# Altium PCB AirBnB-v1.1.PcbDoc (part 1 of 8)
Units mm, origin at the board's own origin, x right, y up, seen from the top; angles counter-clockwise.
Board outline 135.99 x 145 mm, 4 copper layers (Top Layer, Layer 2, Layer 3, Bottom Layer), stack 1.566 mm thick; 343 components, 205 nets, 1123 pads, 557 vias.
Unrouted connection lines stored in the file: 129.
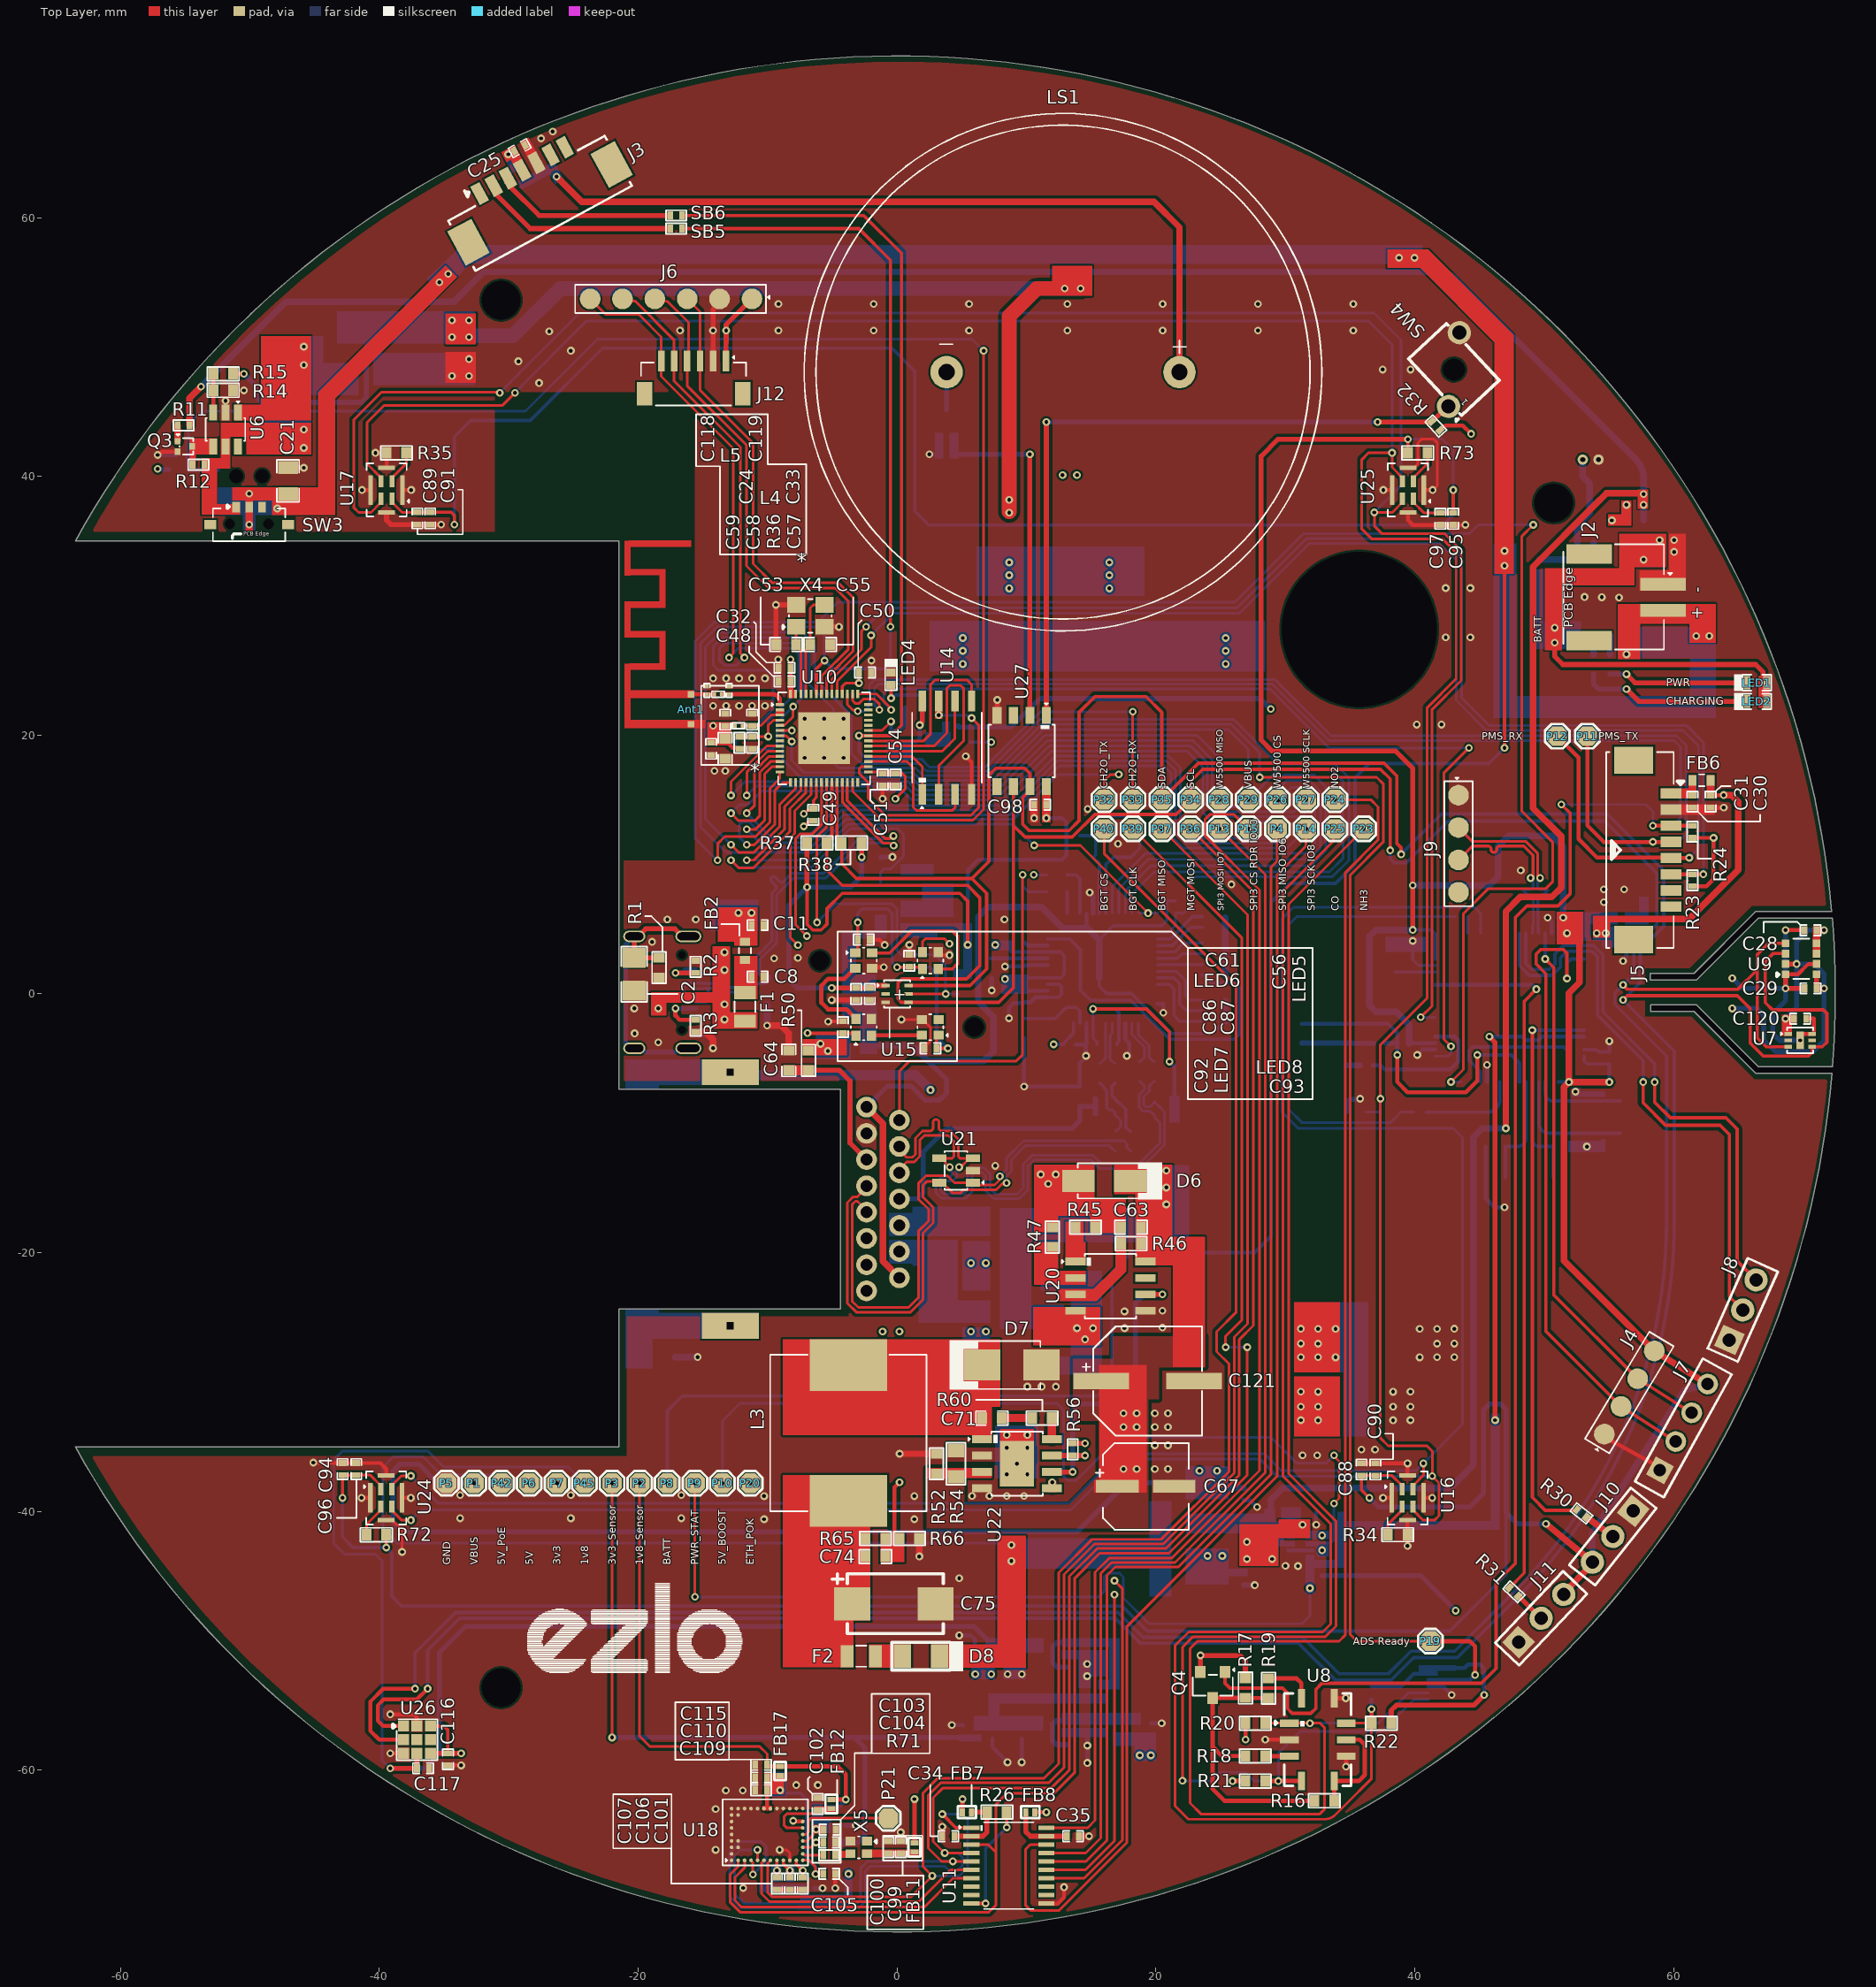
[diagram p0: Top Layer view]
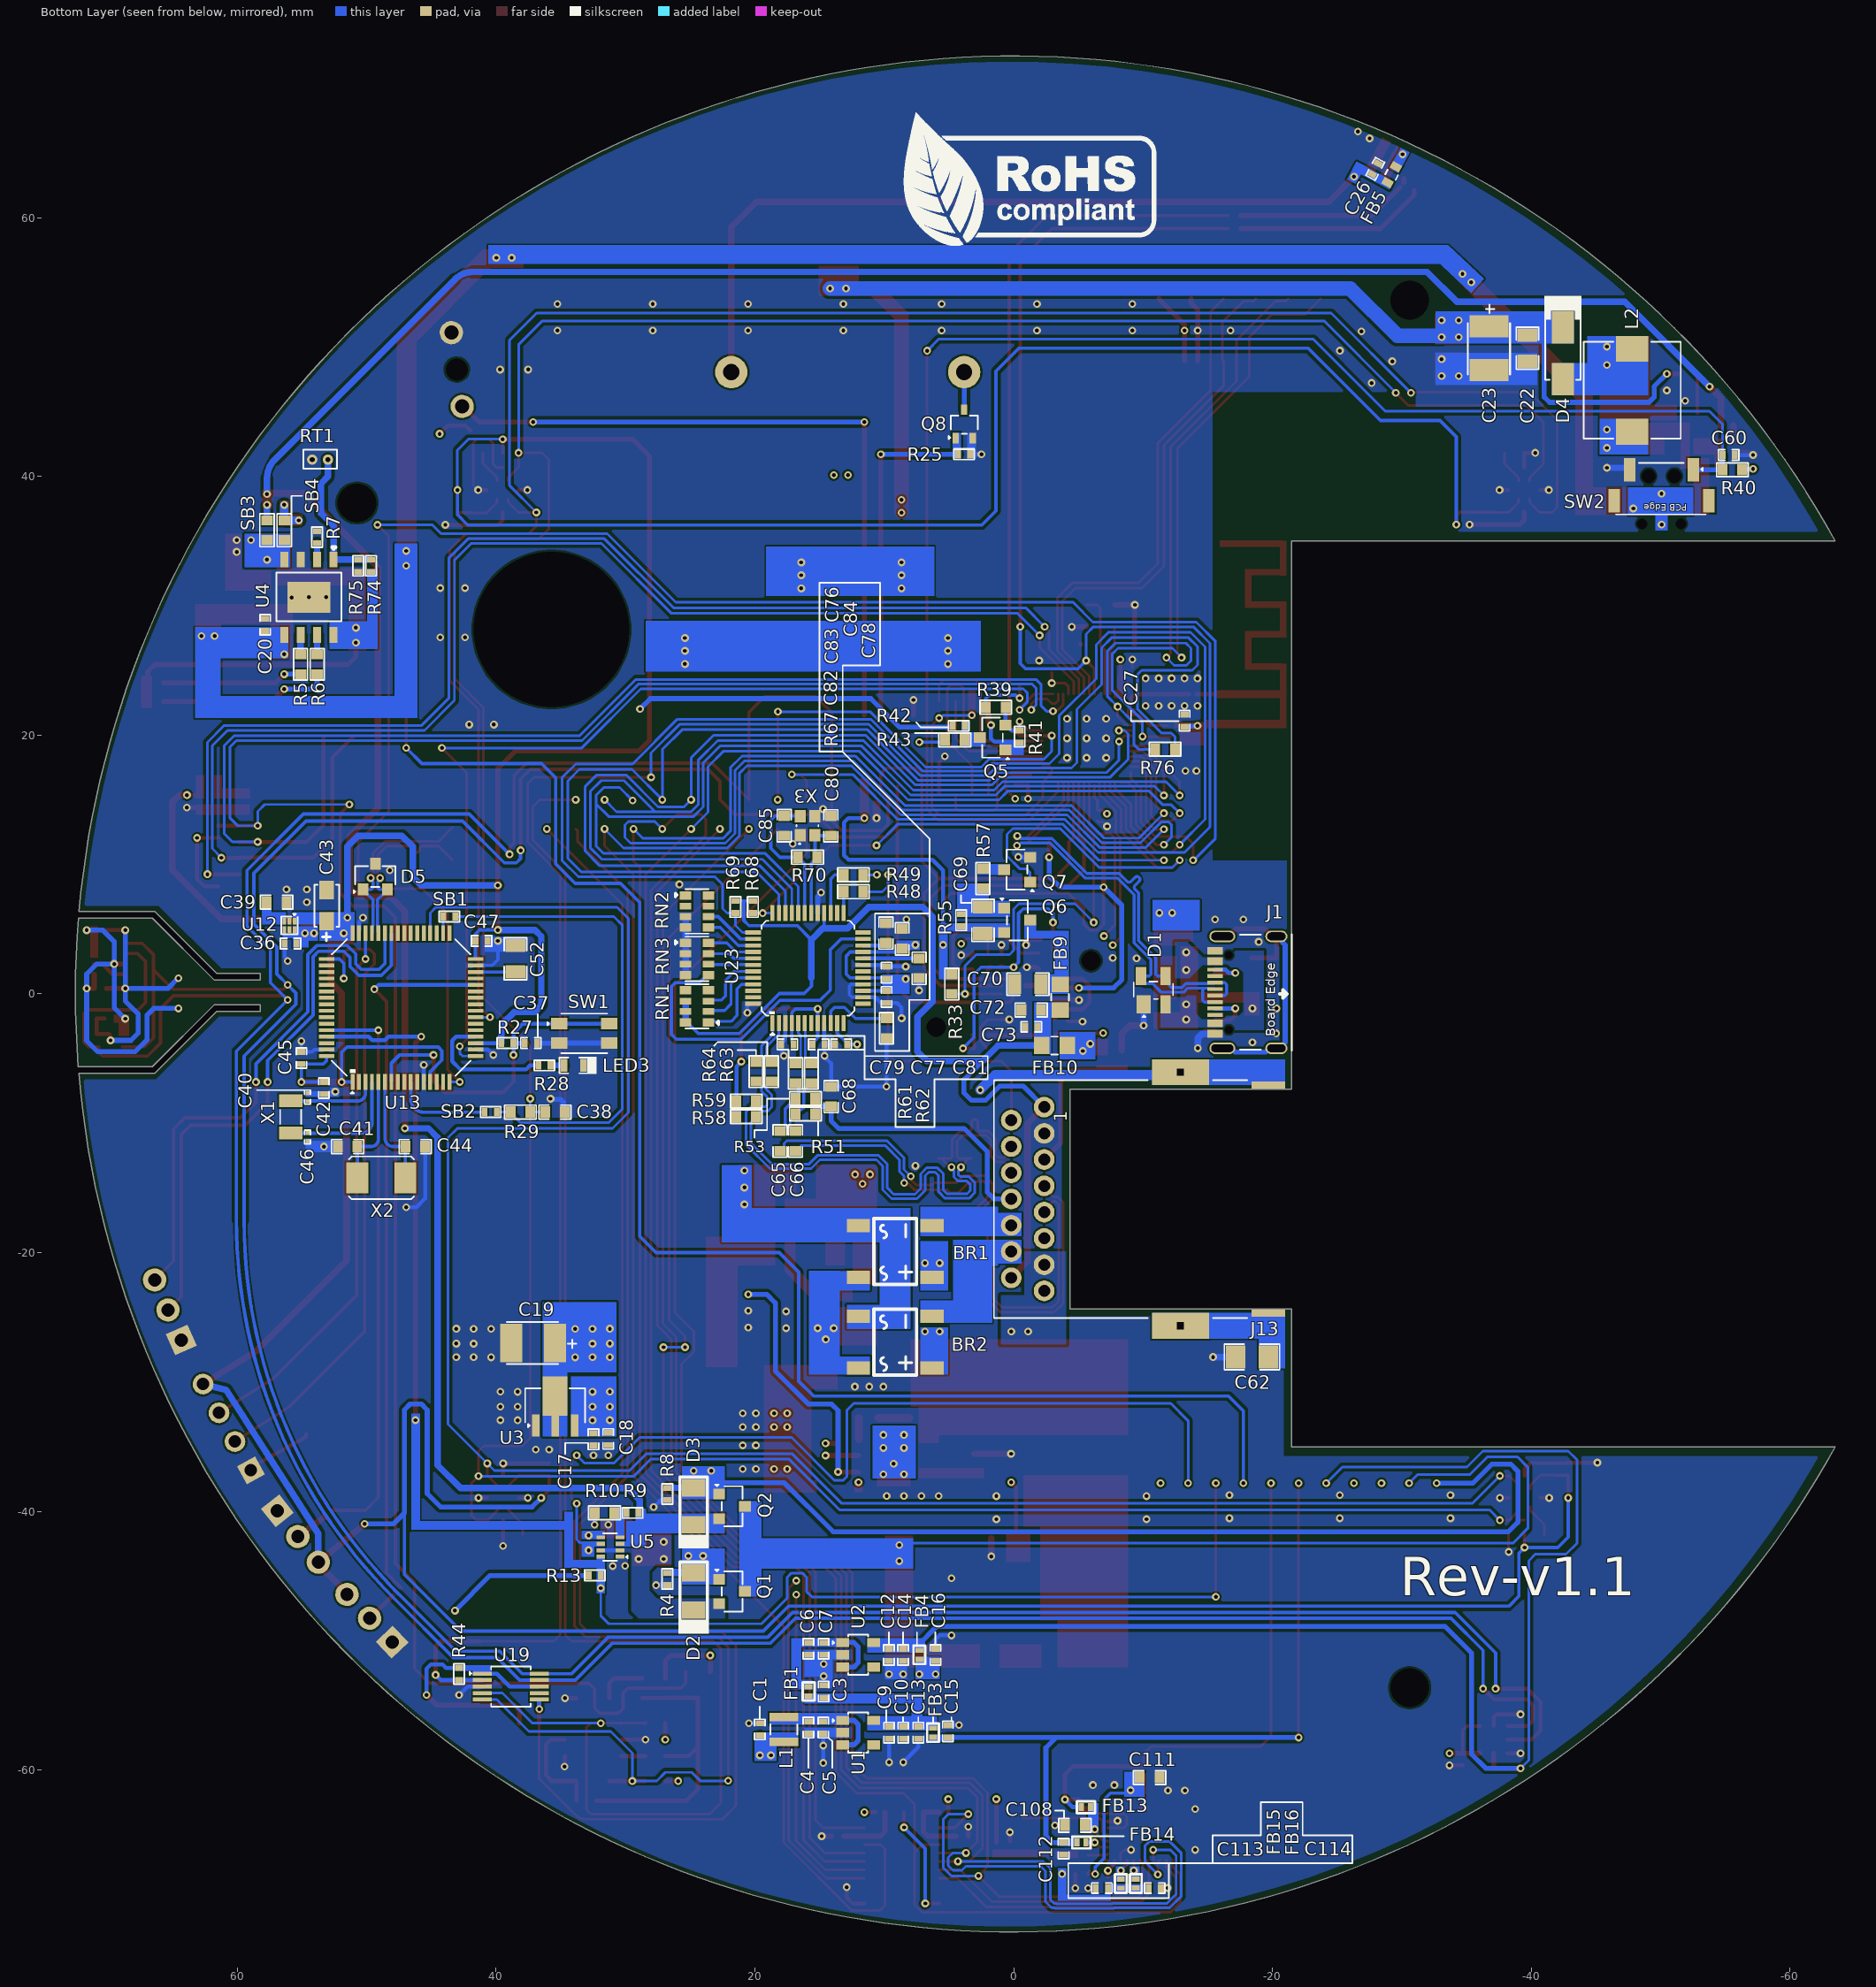
[diagram p1: Bottom Layer view, seen from below]
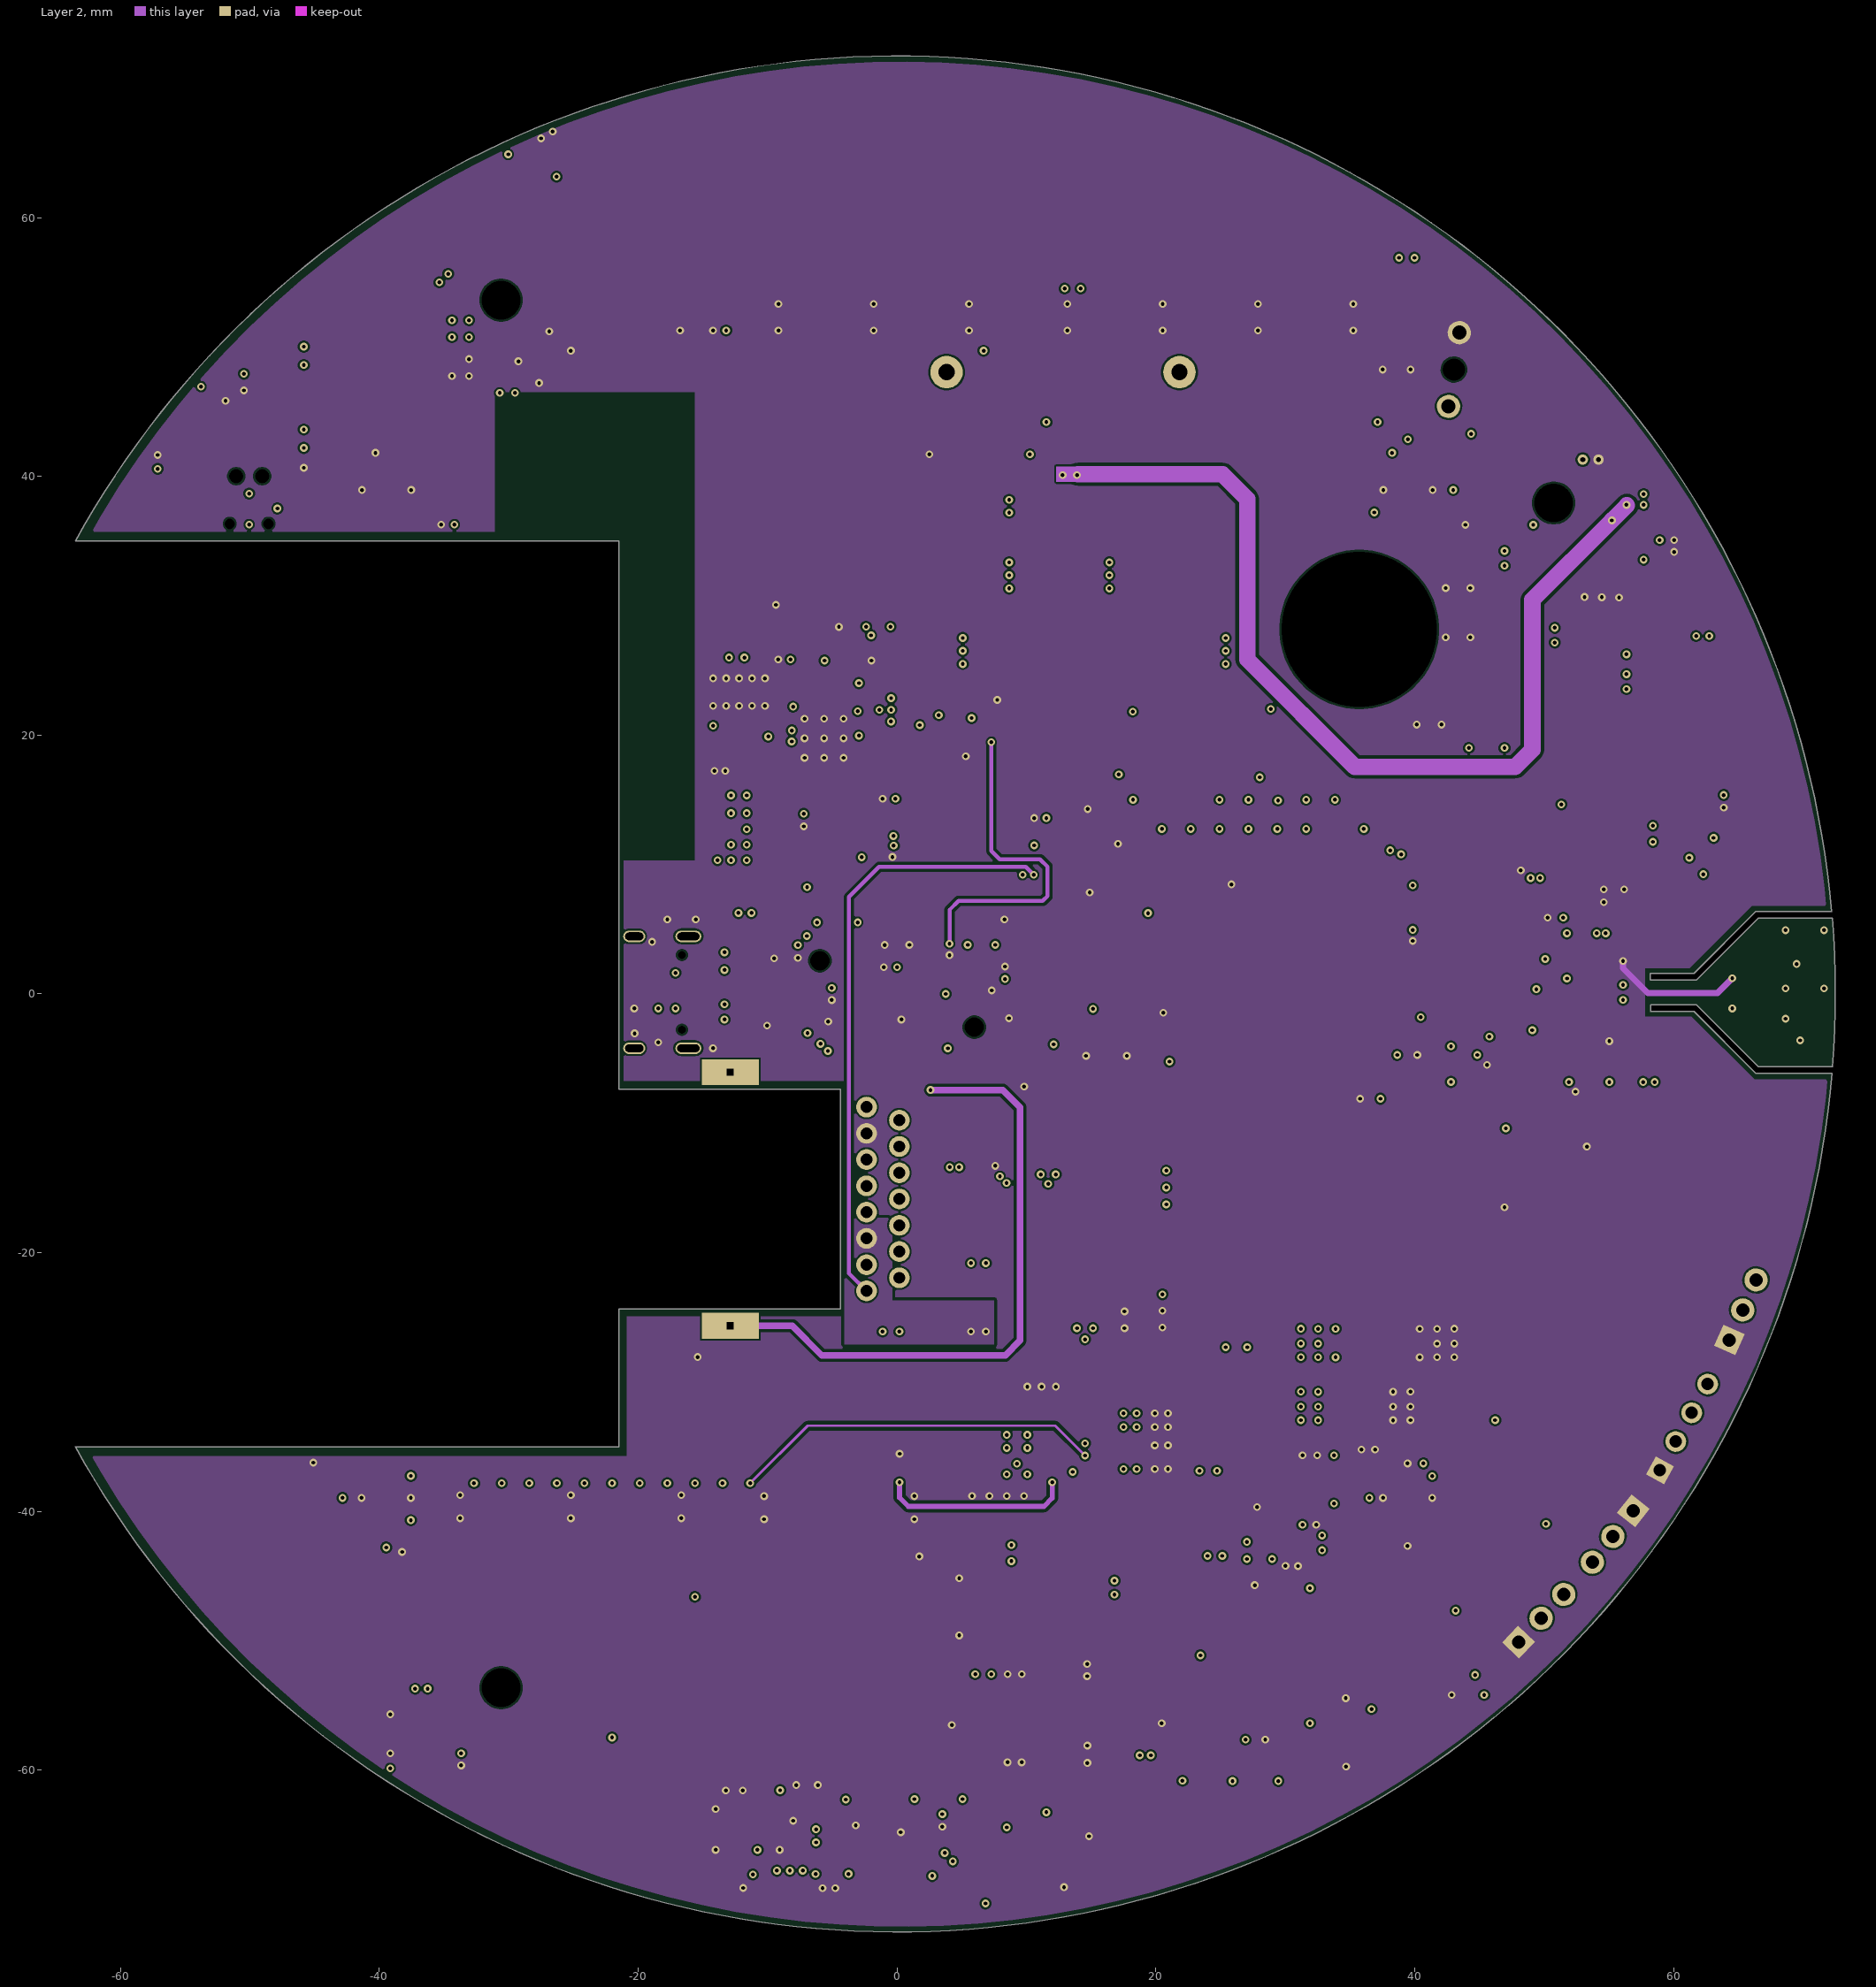
[diagram p2: Layer 2]
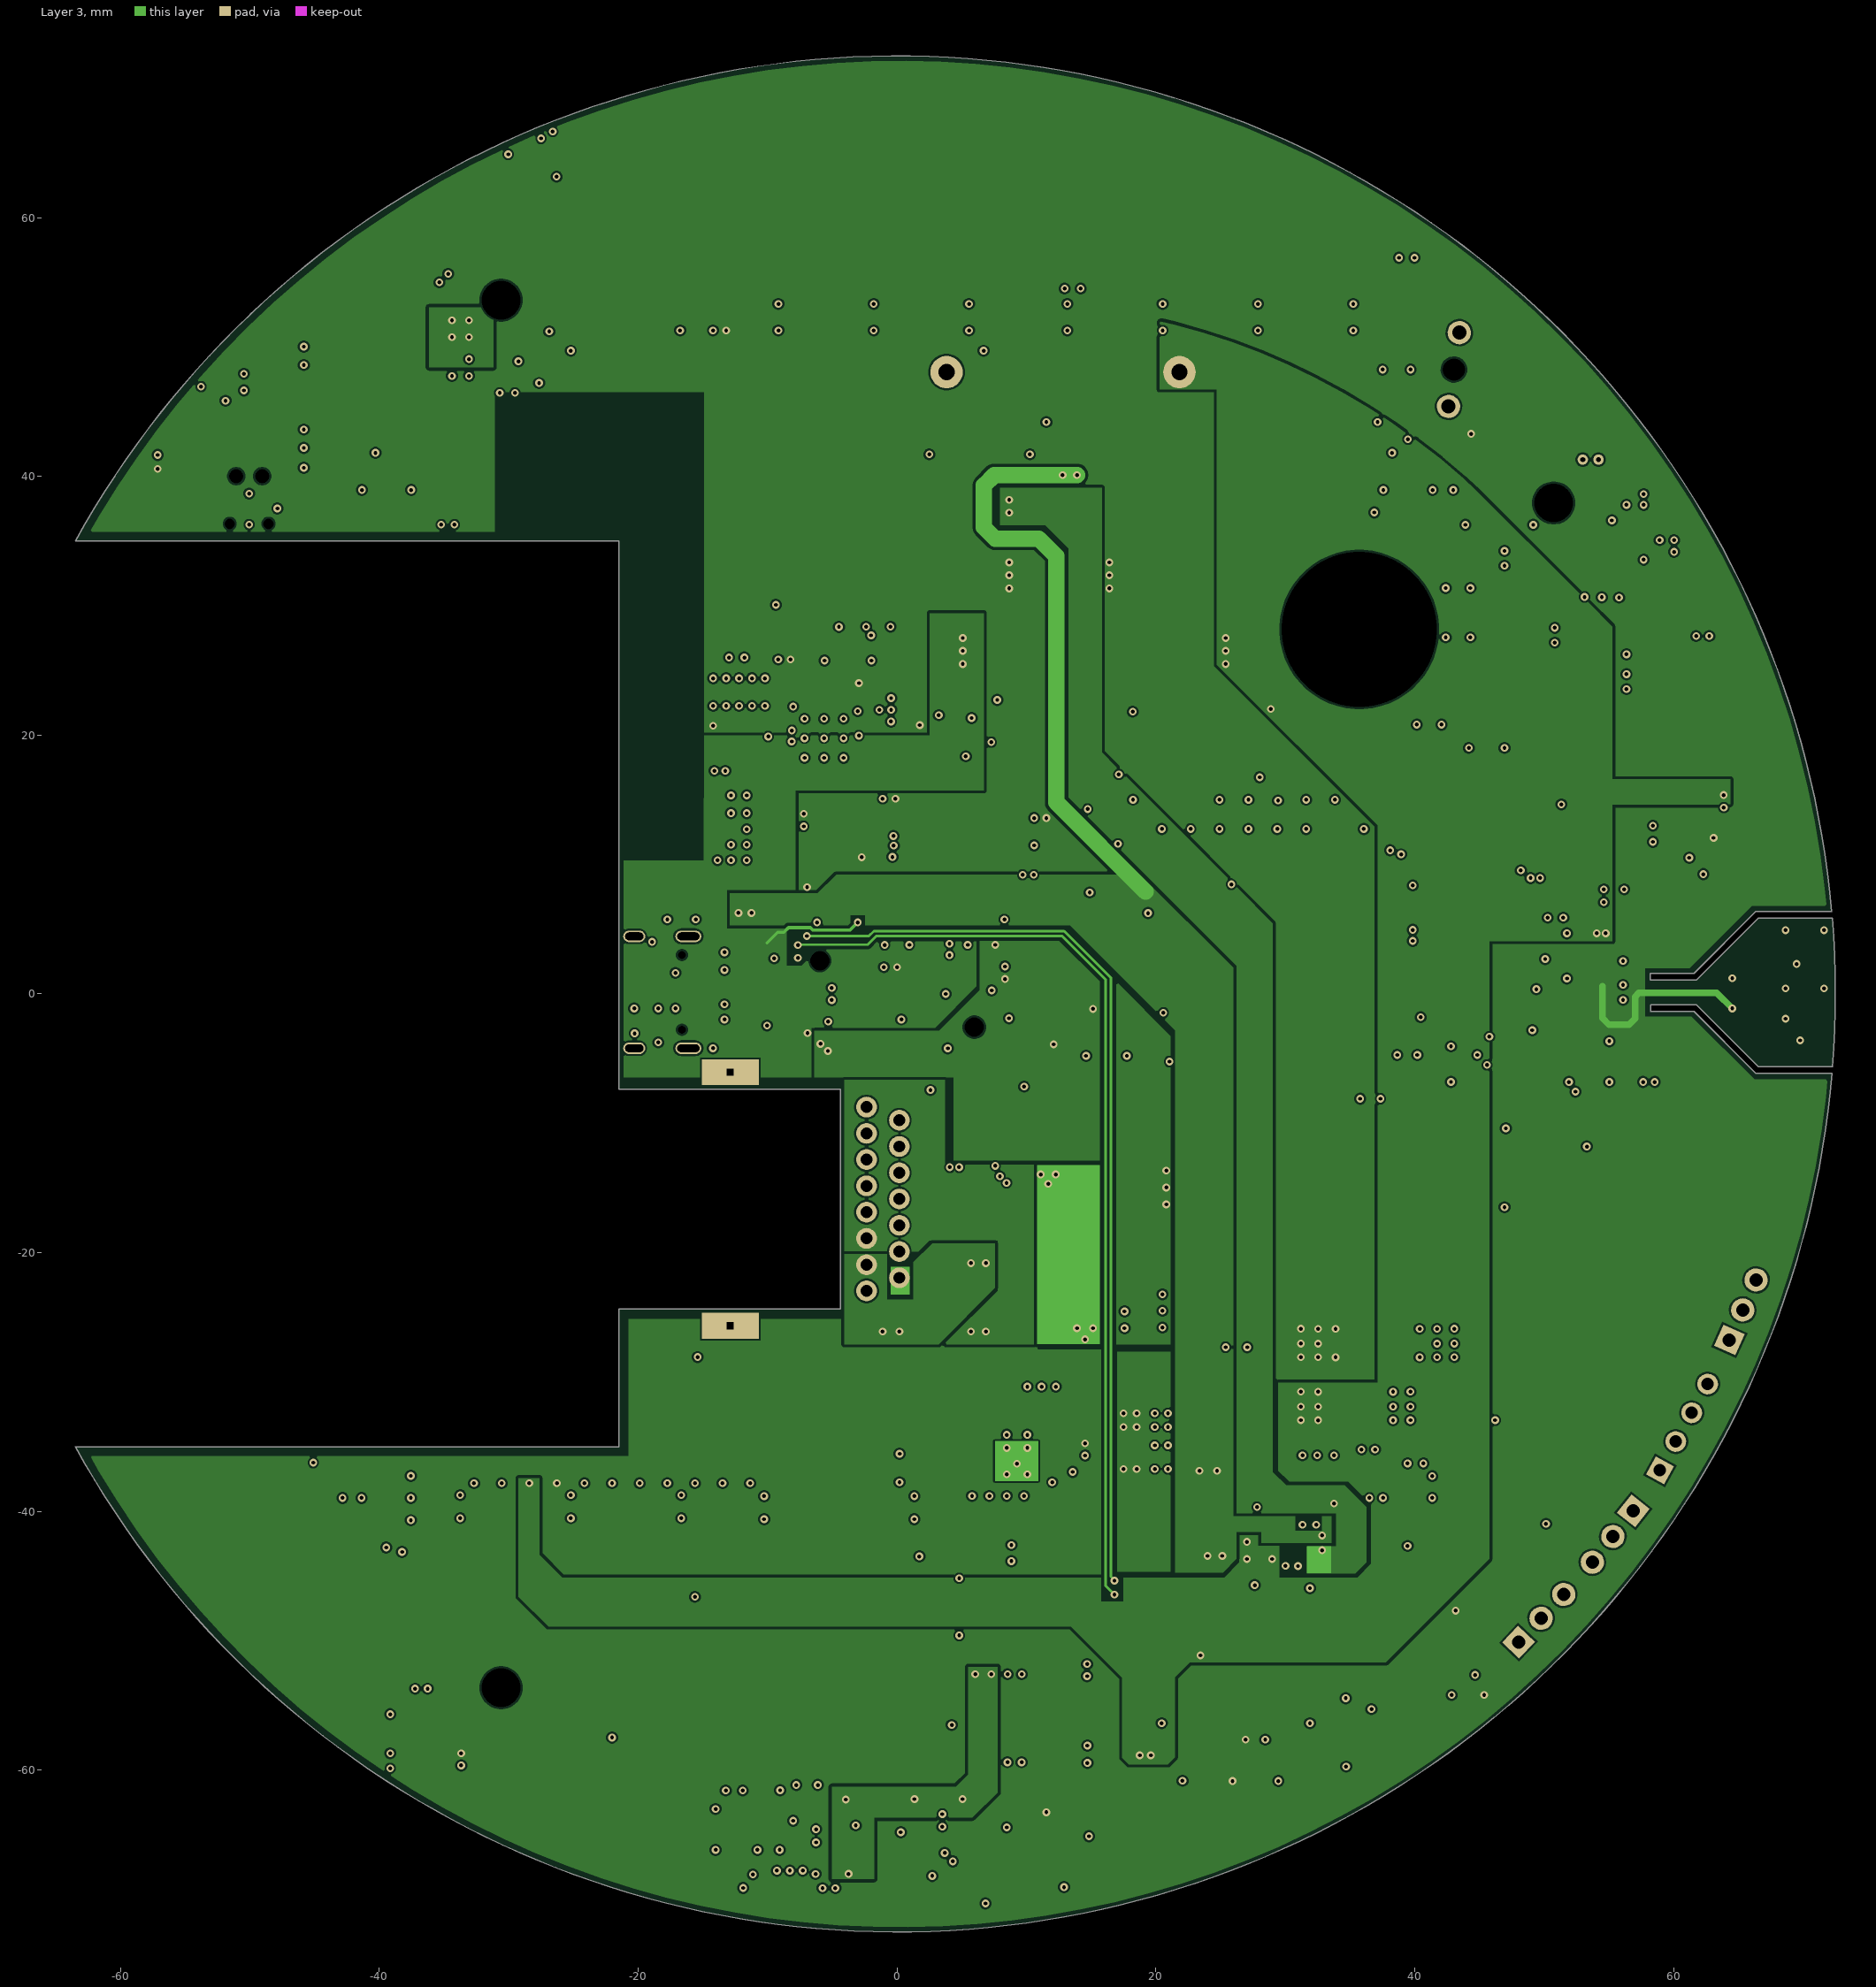
[diagram p3: Layer 3]
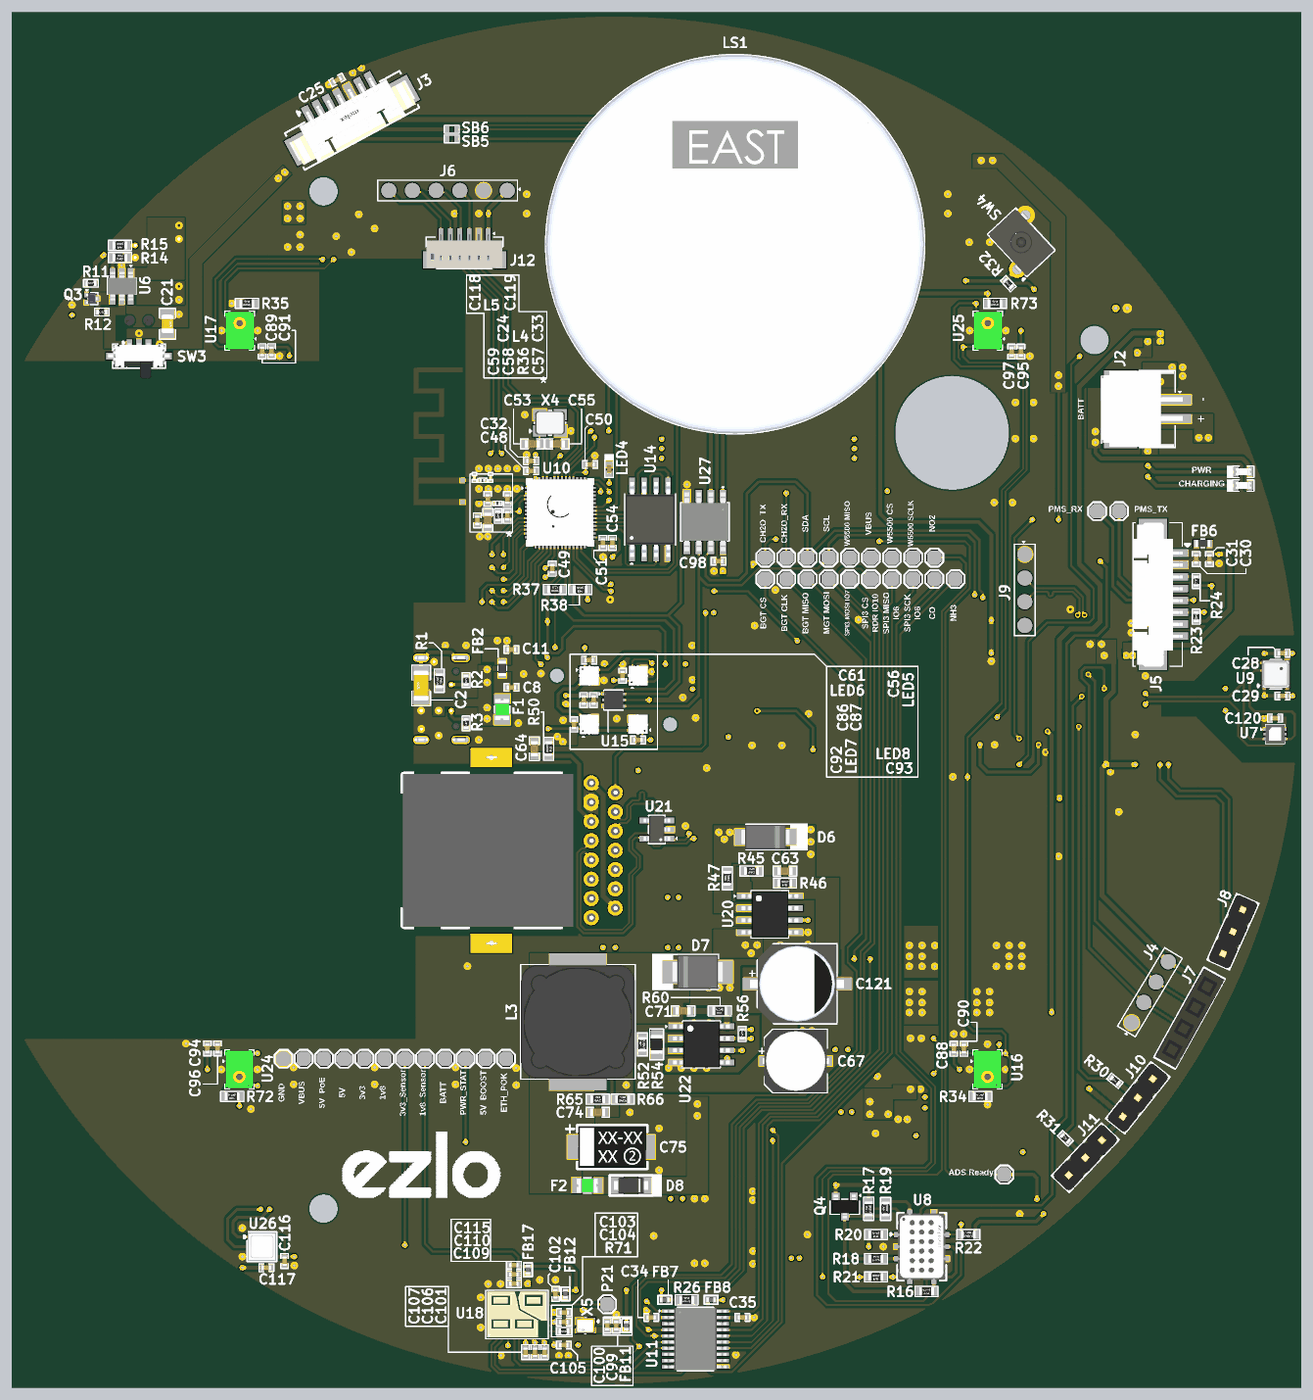
[diagram p7: 3D render of the assembled board from above, using the file's embedded part models]
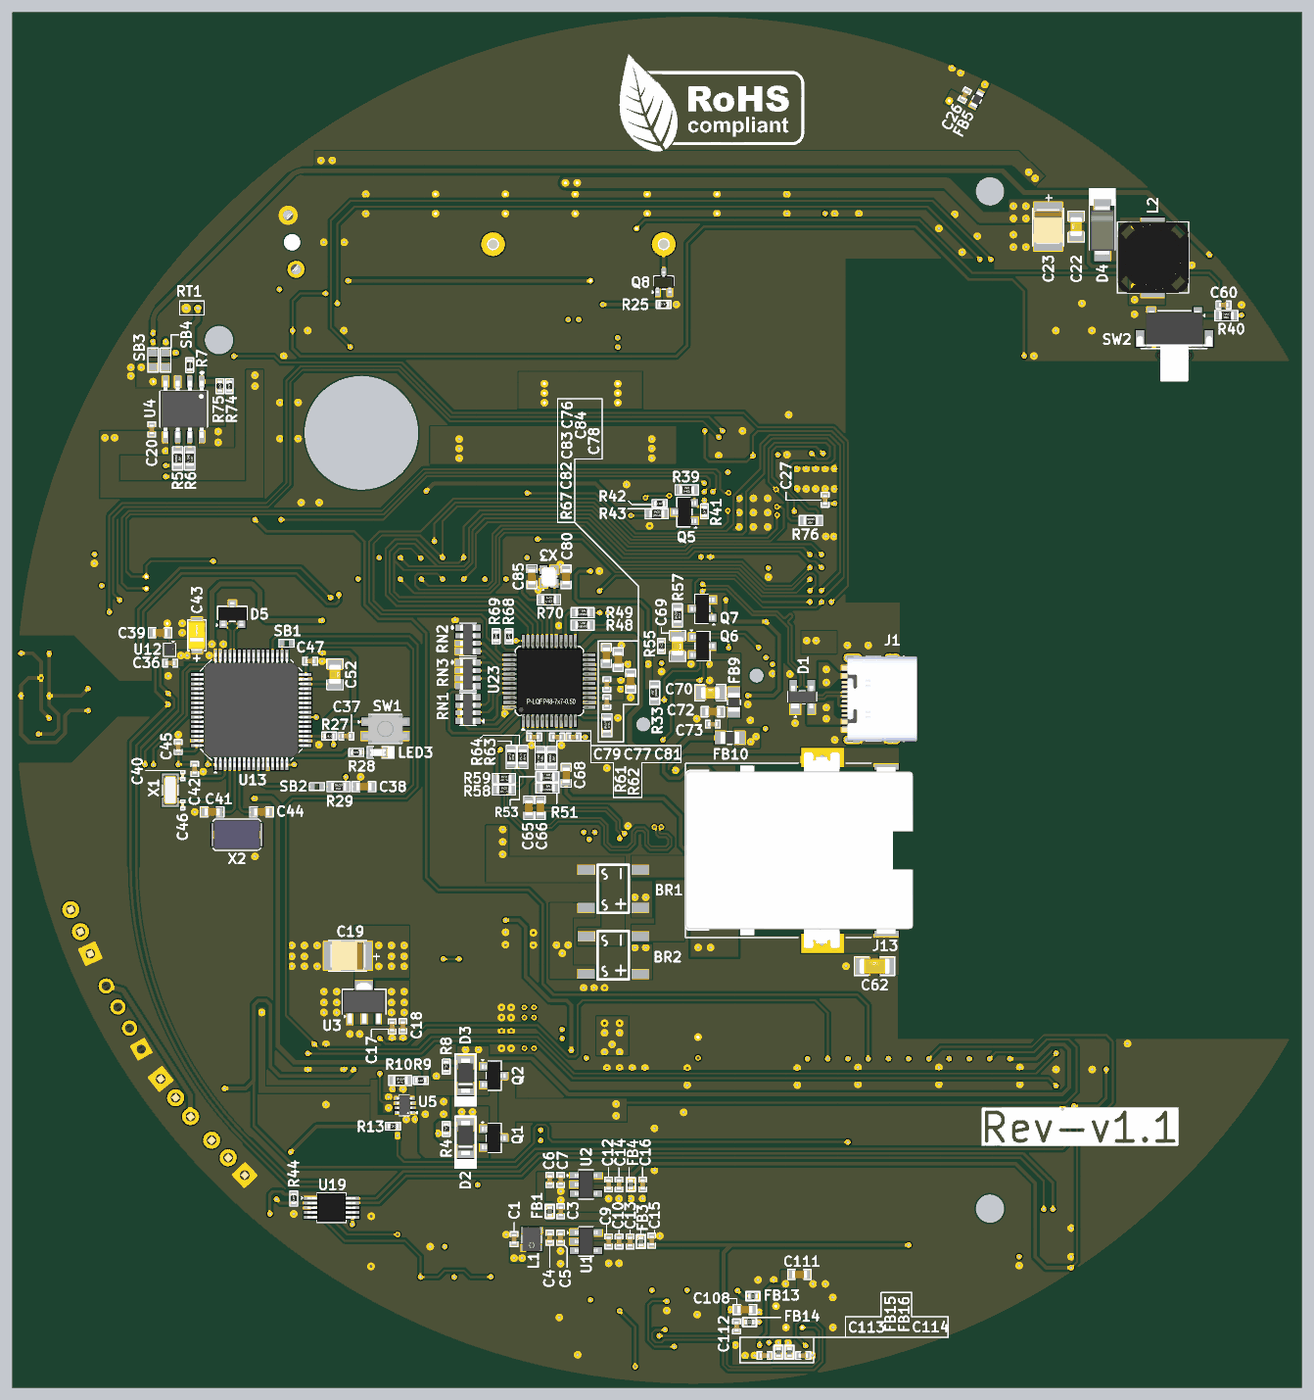
[diagram p8: 3D render of the assembled board from below, using the file's embedded part models]

## Layer stack, top to bottom
Top Solder: solder mask 0.02, Solder Resist, Dk 3.3
Top Layer: signal copper 0.035
Dielectric 2: prepreg 0.203, PP-022, Dk 4.4
Layer 2: signal copper 0.03
Dielectric 1: core 1.03, FR-4, Dk 4.6
Layer 3: signal copper 0.03
Dielectric 3: prepreg 0.203, PP-022, Dk 4.4
Bottom Layer: signal copper 0.035
Bottom Solder: solder mask 0.02, Solder Resist, Dk 3.3

## Board outline
-63.492,-35 -21.492,-35 -21.492,-24.35 -4.359,-24.35 -4.359,-7.35 -21.492,-7.35 -21.492,35 -63.492,35 cw(c0,0) 72.22,6.369 66.358,6.369 61.583,1.594 58.2,1.594 58.2,1.091 58.205,1.086 61.782,1.086 66.557,5.861 72.263,5.861 cw(c0.001,0) 72.282,-5.62 72.283,-5.62 66.557,-5.62 61.783,-0.845 58.222,-0.845 58.222,-1.348 58.227,-1.353 61.583,-1.353 66.357,-6.128 72.241,-6.128 cw(c0,0)

## Design rules (kind name [scope] priority, off if disabled: settings)
Clearance [All] p1: gap=0.127 ignorepadtopadclearanceinfootprint=TRUE except(0.102: SMDPad-Fill; 0.152: Arc-Poly SMDPad-Poly THPad-Poly Via-Poly; 0.178: Track-Region SMDPad-Region THPad-Region Via-Region; 0.254: Track-Poly Poly-Poly Poly-Region Region-Region)
ComponentClearance [All] p1: gap=0 collisioncheckmode=3 verticalgap=0 showdistances=FALSE
DiffPairsRouting "DiffPairsRouting-TypeC2.0 and STM USB" [(InDifferentialPairClass('USB_Lines') OR InDifferentialPairClass('STM_USB_Lines'))] p1: maxlimit=0.508 minlimit=0.127 mostfreqgap=0.508 toplayer_maxgap=0.127 toplayer_prefgap=0.127 toplayer_minwidth=0.229 toplayer_maxwidth=0.229 toplayer_prefwidth=0.229 bottomlayer_maxgap=0.127 bottomlayer_prefgap=0.127 bottomlayer_minwidth=0.229 bottomlayer_maxwidth=0.229 bottomlayer_prefwidth=0.229 impedanceprofiledriven=TRUE impedanceprofileid={138EB197-EF0B-4B95-91F8-66475E0C6942} impedanceprofilevalue=90.000000 maxuncoupledlength=12.7
DiffPairsRouting DiffPairsRouting-Ethercat [InDifferentialPairClass('Ethernet_Lines')] p2: maxlimit=0.305 minlimit=0.152 mostfreqgap=0.305 toplayer_maxgap=0.152 toplayer_prefgap=0.152 toplayer_minwidth=0.203 toplayer_maxwidth=0.203 toplayer_prefwidth=0.203 midlayer1_mingap=0.305 midlayer1_minwidth=0.152 midlayer1_maxwidth=0.152 midlayer1_prefwidth=0.152 midlayer2_mingap=0.305 midlayer2_minwidth=0.152 midlayer2_maxwidth=0.152 midlayer2_prefwidth=0.152 bottomlayer_maxgap=0.152 bottomlayer_prefgap=0.152 bottomlayer_minwidth=0.203 bottomlayer_maxwidth=0.203 bottomlayer_prefwidth=0.203 impedanceprofiledriven=TRUE impedanceprofileid={E30291CC-230C-41C6-9147-3A8EA8AB3948} impedanceprofilevalue=100.000000 maxuncoupledlength=17.78
HoleSize [All] p1: absolutevalues=TRUE maxlimit=12 minlimit=0.025 maxpercent=80.000 minpercent=20.000
HoleToHoleClearance [All] p1: gap=0.127 allowstackedmicrovias=TRUE
MatchedLengths "Schematic Matched Net Lengths_2" [InNetClass('STM_USB')] p1: tolerance=0.508 checknetsindiffpair=TRUE checkdiffpairvsdiffpair=FALSE checkxsignals=FALSE checkothers=FALSE
MatchedLengths "Schematic Matched Net Lengths_1" [InNetClass('USB')] p2: tolerance=0.508 checknetsindiffpair=TRUE checkdiffpairvsdiffpair=FALSE checkxsignals=FALSE checkothers=FALSE
MatchedLengths "Schematic Matched Net Lengths_3" [InNetClass('Ethernet')] p3: tolerance=0.508 checknetsindiffpair=FALSE checkdiffpairvsdiffpair=TRUE checkxsignals=TRUE checkothers=TRUE
MaxMinImpedance "Schematic Impedance Constraint_1" [InNetClass('STM_USB')] p1: minimum=87.00 maximum=92.00
MaxMinImpedance "Schematic Impedance Constraint" [InNetClass('USB')] p2: minimum=87.00 maximum=92.00
MaxMinImpedance "Schematic Impedance Constraint_3" [InNetClass('Ethernet')] p3: minimum=97.00 maximum=105.0
MinimumSolderMaskSliver [All] p1: minsoldermaskwidth=0
PolygonConnect [All] p1: connectstyle=Direct reliefconductorwidth=0.381 reliefentries=4 polygonreliefangle="45 Angle" airgapwidth=0.254
RoutingVias [All] p1: holewidth=0.3 width=0.6 viastyle="Through Hole" minholewidth=0.3 minwidth=0.6 maxholewidth=0.3 maxwidth=0.6
SilkToSilkClearance [All] p1: silktosilkclearance=0
SilkToSolderMaskClearance [IsPad] p1: minsilkscreentomaskgap=0 clearancetoexposedcopper=TRUE
SolderMaskExpansion [All] p1: expansion=0.102 istentingtop=FALSE
UnRoutedNet [All] p1: checkbadconnections=TRUE
Width [All] p1: maxlimit=1.27 minlimit=0.178 preferedwidth=0.381 minimp=50.000000 maximp=50.000000 favimp=50.000000
22 further rules are at their usual default settings.

## Classes and differential pairs
component class U_TestPoint-Sheet: P1 P2 P3 P4 P5 P6 P7 P8 P9 P10 P11 P12 P13 P14 P15 P23 P24 P25 P26 P27 P28 P29 P32 P33 P34 P35 P36 P37 P39 P40 P42 P45
net class RF: NetAnt1_ANT# NetC119_2
component class U_Secondary-PCB: C56 C61 C86 C87 C88 C89 C90 C91 C92 C93 C94 C95 C96 C97 C99 C100 C101 C102 C103 C104 C105 C106 C107 C108 C109 C110 C111 C112 C113 C114 C115 FB11 FB12 FB13 FB14 FB15 FB16 FB17 LED5 LED6 LED7 LED8 P21 R33 R34 R35 R71 R72 R73 U15 U16 U17 U18 U24 U25 X5
differential pair class USB_Lines: USB
differential pair class STM_USB_Lines: USB_D
differential pair class Ethernet_Lines: RD TD
net class USB: USB_N USB_P
net class STM_USB: USB_D_N USB_D_P
net class Ethernet: RD_N RD_P TD_N TD_P
component class U_Sound-Detection-Sheet: C36 C37 C38 C39 C40 C41 C42 C43 C44 C45 C46 C47 C52 D5 J4 J8 J9 J10 J11 LED3 R27 R28 R29 R30 R31 SB1 SB2 SW1 U12 U13 X1 X2 z
component class U_Sensor-Sheet: C25 C26 C28 C29 C30 C31 C116 C117 C120 FB5 FB6 J3 J5 Q4 R16 R17 R18 R19 R20 R21 R22 R23 R24 R32 SB5 SB6 SW4 U7 U8 U9 U26
component class U_Power-Sheet: C1 C2 C3 C4 C5 C6 C7 C8 C9 C10 C11 C12 C13 C14 C15 C16 C17 C18 C19 D1 D2 F1 FB1 FB2 FB3 FB4 J1 L1 Q1 R1 R2 R3 R4 U1 U2 U3
component class U_Level_Shifter_Sheet: C34 C35 FB7 FB8 R26 U11
component class U_Ethernet-PoE-Sheet: BR1 BR2 C62 C63 C64 C65 C66 C67 C68 C69 C70 C71 C72 C73 C74 C75 C76 C77 C78 C79 C80 C81 C82 C83 C84 C85 C121 D6 D7 D8 F2 FB9 FB10 J13 L3 P20 Q6 Q7 R45 R46 R47 R48 R49 R50 R51 R52 R53 R54 R55 R56 R57 R58 R59 R60 R61 R62 R63 R64 R65 R66 R67 R68 R69 R70 RN1 RN2 RN3 U20 U21 U22 U23 X3
component class U_ESP32-Sheet: Ant1 C24 C27 C32 C33 C48 C49 C50 C51 C53 C54 C55 C57 C58 C59 C60 C98 C118 C119 J6 J12 L4 L5 LED4 LS1 P19 Q5 Q8 R25 R36 R37 R38 R39 R40 R41 R42 R43 R44 R76 SW2 U10 U14 U19 U27 X4
component class U_Charging-Boost-Sheet: C20 C21 C22 C23 D3 D4 J2 L2 LED1 LED2 Q2 Q3 R5 R6 R7 R8 R9 R10 R11 R12 R13 R14 R15 R74 R75 RT1 SB3 SB4 SW3 U4 U5 U6
differential pair USB: +USB_P -USB_N
differential pair USB_D: +USB_D_P -USB_D_N
differential pair TD: +TD_P -TD_N
differential pair RD: +RD_P -RD_N

## Components (designator, comment, footprint, x,y, rotation, side; value= is the part's Value field where it differs from the comment)
Ant1 "ESP Patch Anttena" "ESP Patch Antenna" -15.672,20.545 r90 top locked net-tie
BR1 "TB8S" TB8S 9.149,-19.907 r0 bottom locked
BR2 "TB8S" TB8S 9.149,-26.911 r0 bottom locked
C1 "10uF" Cap-0402 19.609,-56.845 r270 bottom locked
C2 "4.7nF" Cap-1206 -20.306,1.524 r90 top locked
C3 "0.1uF" Cap-0402 14.684,-53.911 r270 bottom locked
C4 "10uF" Cap-0402 15.85,-56.706 r90 bottom locked
C5 "0.1uF" Cap-0402 14.707,-56.706 r90 bottom locked
C6 "10uF" Cap-0402 15.849,-50.609 r90 bottom locked
C7 "0.1uF" Cap-0402 14.684,-50.609 r90 bottom locked
C8 "0.1uF" Cap-0402 -10.77,1.333 r180 top locked
C9 "0.1uF" Cap-0402 9.626,-57.091 r90 bottom locked
C10 "10uF" Cap-0402 8.534,-57.091 r90 bottom locked
C11 "0.1uF" Cap-0402 -10.77,5.321 r180 top locked
C12 "0.1uF" Cap-0402 9.632,-51.079 r90 bottom locked
C13 "0.1uF" Cap-0402 7.366,-57.091 r90 bottom locked
C14 "10uF" Cap-0402 8.54,-51.079 r90 bottom locked
C15 "0.1uF" Cap-0402 5.08,-57.003 r270 bottom locked
C16 "0.1uF" Cap-0402 6.038,-51.079 r270 bottom locked
C17 "0.1uF" Cap-0402 32.463,-34.425 r90 bottom locked
C18 "10uF" Cap-0402 31.327,-34.395 r90 bottom locked
C19 "100uF" CASE-B 37.133,-26.983 r0 bottom locked
C20 "10uF" Cap-0402 57.836,28.528 r270 bottom locked
C21 "22uF" Cap-0805 -47.061,39.668 r270 top locked
C22 "22uF" Cap-0805 -39.7,49.914 r90 bottom locked
C23 "33uF" CASE-B -36.728,49.914 r270 bottom locked
C24 "0.1uF" Cap-0402 -13.278,21.202 r270 top locked
C25 "10uF" Cap-0402 -29.16,65.375 r208.5 top
C26 "10uF" Cap-0402 -27.942,63.773 r298.5 bottom
C27 "1uF" Cap-0402 -13.208,21.12 r270 bottom locked
C28 "0.1uF" Cap-0402 70.58,4.928 r0 top locked
C29 "0.1uF" Cap-0402 70.58,0.428 r0 top locked
C30 "10uF" Cap-0402 61.466,14.872 r90 top locked
C31 "10uF" Cap-0402 62.866,14.872 r90 top locked
C32 "1uF" Cap-0402 -8.709,25.206 r0 top locked
C33 "0.1uF" Cap-0402 -11.207,21.201 r270 top locked
C34 "0.1uF" Cap-0402 3.966,-65.099 r0 top locked
C35 "0.1uF" Cap-0402 13.6,-65.099 r180 top locked
C36 "10uF" Cap-0402 55.875,3.889 r180 bottom locked
C37 "0.1uF" Cap-0402 37.301,-3.802 r0 bottom locked
C38 "15pF" Cap-0603 35.444,-9.132 r0 bottom locked
C39 "10nF" Cap-0603 56.952,7.09 r0 bottom locked
C40 "10pF" CAP-0201 54.566,-7.971 r270 bottom locked
C41 "20pF" Cap-0603 51.465,-11.796 r180 bottom locked
C42 "0.1uF" Cap-0402 53.3,-7.276 r270 bottom locked
C43 "10uF" Case-A 53.075,6.822 r90 bottom locked
C44 "20pF" Cap-0603 46.241,-11.796 r0 bottom locked
C45 "0.1uF" Cap-0402 55.036,-4.952 r270 bottom locked
C46 "10pF" CAP-0201 54.566,-11.06 r90 bottom locked
C47 "0.1uF" Cap-0402 41.114,4.098 r0 bottom locked
C48 "0.1uF" Cap-0402 -8.709,24.164 r0 top locked
C49 "0.1uF" Cap-0402 -6.467,13.852 r90 top locked
C50 "0.1uF" Cap-0402 -2.476,24.836 r180 top locked
C51 "0.1uF" Cap-0402 -1.114,16.57 r90 top locked
C52 "2.2uF" Cap-0805 38.495,2.721 r270 bottom locked
C53 "18pF" Cap-0603 -8.568,27 r0 top locked
C54 "1uF" Cap-0402 -0.123,16.57 r90 top locked
C55 "18pF" Cap-0603 -5.944,27 r180 top locked
C56 "0.1uF" Cap-0402 0.948,2.574 r90 top locked
C57 "1uF" Cap-0402 -11.207,19.42 r90 top locked
C58 "22uF" Cap-0603 -13.278,18.951 r90 top locked
C59 "0.1uF" Cap-0402 -14.368,18.95 r90 top locked
C60 "0.1uF" Cap-0402 -55.245,41.654 r0 bottom locked
C61 "0.1uF" Cap-0402 -2.574,4.199 r0 top locked
C62 "1000pF" Cap-1206 -18.419,-28.067 r180 bottom locked
C63 "0.1uF" Cap-0603 18.085,-18.034 r0 top locked
C64 "22nF" Cap-0603 -8.357,-5.131 r90 top locked
C65 "6.8nF" Cap-0603 18.048,-11.366 r90 bottom locked
C66 "6.8nF" Cap-0603 16.854,-11.366 r90 bottom locked
C67 "15uF" VMMC0571J150MV 19.215,-38.063 r0 top locked
C68 "10nF" Cap-0603 14.111,-7.936 r270 bottom locked
C69 "22uF" Cap-0805 2.372,5.695 r270 bottom locked
C70 "22uF" Cap-0805 -1.105,0.762 r180 bottom locked
C71 "0.1uF" Cap-0603 7.33,-32.777 r0 top locked
C72 "10uF" Cap-0603 -1.359,-1.238 r180 bottom locked
C73 "0.1uF" Cap-0402 -1.359,-2.54 r180 bottom locked
C74 "12pF" Cap-0603 -1.673,-43.483 r180 top locked
C75 "330uF" Case-E -3.463,-47.129 r0 top locked
C76 "10nF" Cap-0603 9.869,4.713 r270 bottom locked
C77 "0.1uF" Cap-0402 15.076,-3.898 r0 bottom locked
C78 "4.7uF" Cap-0603 7.307,1.983 r90 bottom locked
C79 "0.1uF" Cap-0402 17.479,-3.898 r180 bottom locked
C80 "12pF" Cap-0603 14.122,12.992 r270 bottom locked
C81 "0.1uF" Cap-0402 13.337,-3.898 r180 bottom locked
C82 "0.1uF" Cap-0402 9.819,-0.228 r90 bottom locked
C83 "0.1uF" Cap-0402 9.819,1.652 r270 bottom locked
C84 "10uF" Cap-0603 8.612,4.26 r270 bottom locked
C85 "12pF" Cap-0603 17.729,12.998 r90 bottom locked
C86 "0.1uF" Cap-0402 -2.115,-0.002 r90 top locked
C87 "1uF" Cap-0402 -3.159,-0.002 r90 top locked
C88 "1uF" Cap-0402 35.89,-36.755 r270 top locked
C89 "1uF" Cap-0402 -36.08,36.755 r90 top locked
C90 "0.1uF" Cap-0402 36.957,-36.755 r270 top locked
C91 "0.1uF" Cap-0402 -37.07,36.755 r90 top locked
C92 "0.1uF" Cap-0402 -4.18,-2.574 r90 top locked
C93 "0.1uF" Cap-0402 2.574,-4.207 r180 top locked
C94 "1uF" Cap-0402 -42.851,-36.726 r270 top locked
C95 "1uF" Cap-0402 42.977,36.725 r90 top locked
C96 "0.1uF" Cap-0402 -41.784,-36.726 r270 top locked
C97 "0.1uF" Cap-0402 41.986,36.725 r90 top locked
C98 "0.1uF" Cap-0402 11.065,14.63 r180 top locked
C99 "1uF" Cap-0402 0.286,-65.962 r90 top locked
C100 "10nF" Cap-0402 -0.674,-65.962 r90 top locked
C101 "0.47uF" Cap-0402 -7.285,-68.761 r270 top locked
C102 "1uF" Cap-0402 -6.124,-62.613 r270 top locked
C103 "1uF" Cap-0402 -5.21,-64.584 r180 top locked
C104 "1uF" Cap-0402 -5.241,-65.582 r180 top locked
C105 "1uF" Cap-0402 -5.241,-68.011 r180 top locked
C106 "0.1uF" Cap-0402 -8.285,-68.761 r90 top locked
C107 "1uF" Cap-0402 -9.285,-68.761 r90 top locked
C108 "22uF" Cap-0603 -4.737,-64.261 r180 bottom locked
C109 "1uF" Cap-0402 -10.505,-61.549 r0 top locked
C110 "1uF" Cap-0402 -10.505,-60.567 r0 top locked
C111 "22uF" Cap-0603 -10.505,-60.567 r0 bottom locked
C112 "10uF" Cap-0402 -3.863,-66.052 r90 bottom locked
C113 "10uF" Cap-0402 -6.815,-69.111 r180 bottom locked
C114 "10uF" Cap-0402 -10.907,-69.111 r0 bottom locked
C115 "10uF" Cap-0402 -10.505,-59.581 r0 top locked
C116 "0.1uF" Cap-0402 -34.709,-59.158 r90 top locked
C117 "0.1uF" Cap-0402 -36.626,-59.854 r180 top locked
C118 "2.7pF" CAP-0201 -14.681,23.461 r270 top locked
C119 "4.7pF" CAP-0201 -12.98,23.461 r270 top locked
C120 "0.1uF" Cap-0402 69.784,-1.911 r180 top locked
C121 "100uF" VKMD1451K101MV 15.768,-29.921 r0 top locked
D1 "SP0503BAHTG" SOT-143-4_ -10.048,-0.806 r90 bottom locked
D2 "DNP" SOD-123FL 24.723,-46.181 r90 bottom locked
D3 "PMEG4030ER" SOD-123FL 24.723,-39.603 r90 bottom locked
D4 "SS34" SMA -42.443,49.518 r270 bottom locked
D5 "ESD5302F-3/TR" Sot-23 49.328,9.068 r180 bottom locked
D6 "SMAJ58A" SMA 16.027,-14.453 r180 top locked
D7 "SS510B" SMB_ 8.865,-28.678 r180 top locked
D8 "PMEG4030ER" SOD-123FL 1.848,-51.183 r180 top locked
F1 "BSMD0805L-200" Fuse-0805 -11.755,-0.996 r90 top locked
F2 "BSMD0805L-200" Fuse-0805 -2.769,-51.183 r0 top locked
FB1 "BLM15PD121SN1D" IND-0402 15.849,-53.911 r90 bottom locked
FB2 "BLM18SG121TN1D" "IND-0603 (1608 Metric)" -11.748,3.327 r90 top locked
FB3 "BLM15PD121SN1D" IND-0402 6.223,-57.091 r270 bottom locked
FB4 "BLM15PD121SN1D" IND-0402 7.285,-51.079 r270 bottom locked
FB5 "BLM18SG121TN1D" "IND-0603 (1608 Metric)" -29.218,63.321 r298.5 bottom
FB6 "BLM18SG121TN1D" "IND-0603 (1608 Metric)" 62.166,16.51 r0 top locked
FB7 "BLM15PD121SN1D" IND-0402 5.4,-63.246 r0 top locked
FB8 "BLM15PD121SN1D" IND-0402 10.295,-63.246 r180 top locked
FB9 "CBM201209U601T" Ind-0805 -3.594,-0.254 r270 bottom locked
FB10 "CBM201209U601T" Ind-0805 -3.159,-3.988 r180 bottom locked
FB11 "100MHz" IND-0402 1.343,-65.961 r90 top locked
FB12 "100MHz" IND-0402 -5.079,-62.613 r90 top locked
FB13 "100MHz" IND-0402 -5.586,-62.854 r0 bottom locked
FB14 "100MHz" IND-0402 -5.241,-65.582 r0 bottom locked
FB15 "100MHz" IND-0402 -8.285,-68.761 r270 bottom locked
FB16 "100MHz" IND-0402 -9.437,-68.761 r270 bottom locked
FB17 "100MHz" IND-0402 -9.037,-60.061 r90 top locked
J1 "TYPE-C-31-M-12" TYPE-C-31-M-12_ -15.556,-3.073 r90 bottom locked
J2 "WAFER-PH2.0-2PWB" WAFER-PH2.0-2PWB 56.337,30.658 r270 top locked
J3 "53261-0771" 53261-0771 -28.279,62.385 r28.5 top
J4 "POGO Connector 4 Pin" "Pogo 4 Pin" 56.584,-30.81 r59 top
J5 "0532610871" 53261-0871 58.358,11.128 r270 top locked
J6 "POGO Connector 6 Pin" "POGO 6 Pin" -16.215,53.721 r180 top
J7 "C2718488" "HDR1X4 Female" 60.788,-33.484 r61 top
J8 "61300311121" HDR1X3_ 64.313,-26.746 r66 top
J9 "POGO Connector 4 Pin" "Pogo 4 Pin" 43.383,11.608 r270 top locked
J10 "61300311121" HDR1X3_ 56.891,-39.949 r231.5 top
J11 "61300311121" HDR1X3_ 48.019,-50.098 r46.5 top
J12 "Voltlink Target" "Voltlink Target" -15.723,47.65 r180 top locked
J13 "HR915302AE" HR915302AE -9.754,-15.85 r90 bottom locked
L1 "10uH" "IND-1008 (2520 Metric)" 17.755,-56.845 r90 bottom locked
L2 "22uH" SMRH74-220MT -47.803,46.66 r90 bottom locked
L3 "33uH" CYH127-33UH -3.759,-33.928 r270 top locked
L4 "2nH" IND-0201 -12.243,20.729 r0 top locked
L5 "1.6nH" IND-0201 -13.83,23.161 r0 top locked
LED1 "Emerald" LED-0603 66.437,24.054 r180 top locked
LED2 "RED" LED-0603 66.437,22.606 r180 top locked
LED3 "RED" LED-0603 33.99,-5.522 r180 bottom locked
LED4 "XZVG68W-2" LED-0402 -0.462,24.361 r90 top locked
LED5 "SK6812-EC20" SK6812-EC20 2.574,2.574 r270 top locked
LED6 "SK6812-EC20" SK6812-EC20 -2.574,2.574 r180 top locked
LED7 "SK6812-EC20" SK6812-EC20 -2.574,-2.574 r270 top locked
LED8 "SK6812-EC20" SK6812-EC20 2.574,-2.574 r0 top locked
LS1 "EFM-620" EFM-620 12.823,48.058 r0 top locked
P1 "TEST POINT" Test-point -32.69,-37.821 r180 top locked
P2 "TEST POINT" Test-point -19.888,-37.821 r0 top locked
P3 "TEST POINT" Test-point -22.022,-37.821 r0 top locked
P4 "TEST POINT" Test-point 29.379,12.751 r270 top locked
P5 "TEST POINT" Test-point -34.823,-37.821 r90 top
P6 "TEST POINT" Test-point -28.423,-37.821 r0 top locked
P7 "TEST POINT" Test-point -26.289,-37.821 r180 top locked
P8 "TEST POINT" Test-point -17.755,-37.821 r0 top locked
P9 "TEST POINT" Test-point -15.621,-37.821 r180 top locked
P10 "TEST POINT" Test-point -13.487,-37.821 r90 top locked
P11 "TEST POINT" Test-point 53.336,19.921 r90 top locked
P12 "TEST POINT" Test-point 51.011,19.921 r90 top locked
P13 "TEST POINT" Test-point 24.92,12.751 r90 top locked
P14 "TEST POINT" Test-point 31.609,12.751 r90 top locked
P15 "TEST POINT" Test-point 27.15,12.751 r270 top locked
P19 "TEST POINT" Test-point 41.213,-50.023 r0 top locked
P20 "TEST POINT" Test-point -11.354,-37.821 r270 top locked
P21 "TEST POINT" Test-point -0.671,-63.711 r0 top locked
P23 "TEST POINT" Test-point 36.068,12.751 r0 top locked
P24 "TEST POINT" Test-point 33.838,15.011 r0 top locked
P25 "TEST POINT" Test-point 33.838,12.751 r0 top locked
P26 "TEST POINT" Test-point 29.379,15.011 r0 top locked
P27 "TEST POINT" Test-point 31.609,15.011 r0 top locked
P28 "TEST POINT" Test-point 24.92,15.011 r0 top locked
P29 "TEST POINT" Test-point 27.15,15.011 r0 top locked
P32 "TEST POINT" Test-point 16.002,15.011 r0 top locked
P33 "TEST POINT" Test-point 18.232,15.011 r0 top locked
P34 "TEST POINT" Test-point 22.691,15.011 r0 top locked
P35 "TEST POINT" Test-point 20.461,15.011 r0 top locked
P36 "TEST POINT" Test-point 22.691,12.751 r0 top locked
P37 "TEST POINT" Test-point 20.461,12.751 r0 top locked
P39 "TEST POINT" Test-point 18.232,12.751 r0 top locked
P40 "TEST POINT" Test-point 16.002,12.751 r0 top locked
P42 "TEST POINT" Test-point -30.556,-37.821 r0 top locked
P45 "TEST POINT" Test-point -24.155,-37.821 r0 top locked
Q1 "DNP" SOT-23 21.761,-46.181 r270 bottom locked
Q2 "SI2323DS" SOT-23 21.761,-39.603 r270 bottom locked
Q3 "MMBT3904M" SOT-723 -55.032,42.316 r270 top locked
Q4 "WPM2015-3/TR" Sot-23 24.391,-53.413 r180 top locked
Q5 "Si2302CDS" Sot-23 1.625,19.82 r90 bottom locked
Q6 "WPM2015-3/TR" Sot-23 -0.27,5.695 r270 bottom locked
Q7 "LMUN2211LT1G" SOT-23 -0.27,9.611 r90 bottom locked
Q8 "2SK3018T106" SOT_323 3.823,44.061 r180 bottom locked
R1 "1M" Res-0603 -18.392,2.032 r90 top locked
R2 "5.1K" Res-0402 -15.559,2.095 r270 top locked
R3 "5.1K" Res-0402 -15.559,-2.471 r90 top locked
R4 "10K" Res-0402 26.765,-45.221 r270 bottom locked
R5 "1K" Res-0603 55.093,25.476 r90 bottom locked
R6 "1K" Res-0603 53.823,25.476 r90 bottom locked
R7 "1.2K" Res-0402 53.823,35.3 r90 bottom locked
R8 "10K" Res-0402 26.765,-38.65 r270 bottom locked
R9 "3.3K" Res-0402 29.445,-40.111 r180 bottom locked
R10 "1K" Res-0603 31.611,-40.111 r180 bottom locked
R11 "10K" Res-0402 -55.137,43.942 r0 top locked
R12 "10K" Res-0402 -53.987,40.905 r0 top locked
R13 "10K" Res-0402 32.372,-44.945 r0 bottom locked
R14 "8.2K" Res-0603 -52.07,46.65 r180 top locked value=8.2kR
R15 "62K" Res-0603 -52.07,47.93 r0 top locked
R16 "820R" Res-0603 33.018,-62.363 r0 top locked
R17 "DNP" Res-0603 26.916,-53.651 r270 top locked
R18 "27R" Res-0603 27.687,-58.903 r180 top locked
R19 "130R" Res-0603 28.7,-53.663 r270 top locked
R20 "15K" Res-0603 27.687,-56.363 r0 top locked value=15kR
R21 "1M" Res-0603 27.687,-60.833 r0 top locked
R22 "1M" Res-0603 37.428,-56.368 r180 top locked
R23 "10K" Res-0402 61.466,8.783 r270 top locked
R24 "10K" Res-0402 61.466,12.533 r270 top locked
R25 "10K" Res-0402 3.823,41.705 r0 bottom locked
R26 "0R" Res-0603 7.709,-63.246 r180 top locked
R27 "10K" Res-0402 39.117,-3.795 r180 bottom locked
R28 "1.2K" Res-0402 36.257,-5.522 r180 bottom locked
R29 "100R" Res-0603 38.114,-9.132 r180 bottom locked
R30 "10K" Res-0402 52.893,-40.146 r141.5 top
R31 "10K" Res-0402 47.666,-46.214 r136.5 top
R32 "10K" Res-0402 41.637,43.901 r313 top locked
R33 "10K" Res-0603 4.783,0.762 r270 bottom locked
R34 "10K" Res-0603 38.689,-41.795 r0 top locked
R35 "10K" Res-0603 -38.688,41.82 r180 top locked
R36 "10K" Res-0402 -12.172,19.42 r270 top locked
R37 "4.7K" Res-0603 -6.194,11.668 r180 top locked
R38 "4.7K" Res-0603 -3.514,11.668 r0 top locked
R39 "1K" Res-0603 1.387,22.151 r0 bottom locked
R40 "10K" Res-0603 -55.537,40.519 r180 bottom locked
R41 "10K" Res-0402 -0.468,19.888 r90 bottom locked
R42 "10K" Res-0402 4.252,20.723 r180 bottom
R43 "1K" Res-0603 4.547,19.634 r0 bottom
R44 "10K" Res-0402 42.851,-52.564 r90 bottom locked
R45 "180K" Res-0603 14.554,-18.034 r180 top locked value=180kR
R46 "24.9K" Res-0603 18.085,-19.303 r0 top locked
R47 "4.42K" Res-0603 11.999,-18.796 r270 top locked value=4.42kR
R48 "330R" Res-0603 12.377,7.896 r0 bottom locked
R49 "330R" Res-0603 12.377,9.208 r0 bottom locked
R50 "10R" Res-0603 -6.845,-5.131 r90 top locked
R51 "49.9R" Res-0603 16.092,-9.283 r0 bottom locked
R52 "4.7K" Res-0603 3.048,-36.31 r270 top locked
R53 "49.9R" Res-0603 16.092,-8.089 r0 bottom locked
R54 "30mR" RES-0805 4.546,-36.31 r270 top locked
R55 "10K" Res-0402 4.055,5.695 r90 bottom locked
R56 "10K" Res-0402 13.57,-35.205 r90 top locked
R57 "1K" Res-0603 2.372,8.919 r90 bottom locked
R58 "49.9R" Res-0603 20.664,-9.486 r0 bottom locked
R59 "49.9R" Res-0603 20.664,-8.292 r0 bottom locked
R60 "4.7R" Res-0603 11.206,-32.777 r0 top locked
R61 "33R" Res-0603 16.854,-6.133 r90 bottom locked
R62 "33R" Res-0603 15.635,-6.133 r90 bottom locked
R63 "33R" Res-0603 19.902,-6.006 r90 bottom locked
R64 "33R" Res-0603 18.709,-6.006 r90 bottom locked
R65 "301K" Res-0603 -1.673,-42.088 r180 top locked
R66 "57.6K" Res-0603 0.953,-42.088 r180 top locked
R67 "12.4K" Res-0603 9.819,-2.653 r90 bottom locked
R68 "10K" Res-0402 20.142,6.718 r270 bottom locked
R69 "10K" Res-0402 21.5,6.718 r270 bottom locked
R70 "1M" Res-0603 15.926,10.566 r0 bottom locked
R71 "150R" Res-0402 -5.241,-66.562 r0 top locked
R72 "10K" Res-0603 -40.238,-41.796 r0 top locked
R73 "10K" Res-0603 40.238,41.82 r180 top locked
R74 "4.7K" Res-0402 49.657,33.096 r270 bottom locked
R75 "86.6K" Res-0402 50.643,33.096 r90 bottom locked value=86.6kR
R76 "0R" Res-0603 -11.704,18.91 r180 bottom locked
RN1 "10K" YC164-FR-0710KL 23.585,-2.196 r0 bottom locked value=10kR
RN2 "10K" YC164-FR-0710KL 25.355,7.62 r180 bottom locked value=10kR
RN3 "10K" YC164-FR-0710KL 25.355,3.946 r180 bottom locked value=10kR
RT1 "10K" "MF52B 103F3950-100" 53.984,41.3 r180 bottom locked
SB1 "Solder Bridge 0402" "Solder Bridge 0402" 43.614,5.984 r180 bottom locked
SB2 "Solder Bridge 0402" "Solder Bridge 0402" 40.413,-9.132 r180 bottom locked
SB3 "Solder Bridge 0603" "Solder Bridge" 57.694,35.839 r270 bottom locked
SB4 "Solder Bridge 0603" "Solder Bridge" 56.363,35.839 r270 bottom locked
SB5 "Solder Bridge 0402" "Solder Bridge 0402" -17.069,59.157 r180 top
SB6 "Solder Bridge 0402" "Solder Bridge 0402" -17.069,60.169 r180 top
SW1 "TS-1185EC-C-D-B" TS-1185EC-C-D-B_ 33.183,-3.045 r180 bottom locked
SW2 "TP12422673" TP12422673 -50.063,39.319 r0 bottom locked
SW3 "MK-11C04-G013" MK-11C04-G013 -50.068,36.937 r0 top locked
SW4 "K5-1678DA-01" K5-1678DA-01 43.028,48.26 r133 top locked
U1 "XC6228D332VR-G" SOT-25-5 12.008,-57.091 r180 bottom locked
U2 "XC6228D182VR-G" SOT-25-5 12.014,-51.079 r180 bottom locked
U3 "LD1117AG-33-AB3-A-R" SOT-89-3 35.433,-32.218 r180 bottom locked
U4 "TP4056-42-ESOP8" ESOP-8 54.458,30.658 r270 bottom locked
U5 "TPS2116DRLR" SOT-583 31.162,-42.748 r0 bottom locked
U6 "MT3608" SOT-23-6 -51.892,43.626 r270 top locked
U7 "GXHTC3" DFN-6-EP(2x2) 69.784,-3.588 r0 top locked
U8 "MICS-6814" MICS-6814 30.31,-56.368 r0 top locked
U9 "BME680" BME680 69.85,2.718 r180 top locked
U10 "ESP32-S3R8" "56-QFN (7x7)" -5.639,19.761 r0 top locked
U11 "TXS0108EPWR" TSSOP-20 8.634,-67.374 r0 top locked
U12 "LDK120PU33R" "6-DFN (1.2x1.3)" 55.958,5.287 r270 bottom locked
U13 "STM32F446RCT6" "64-LQFP (10x10)" 47.334,-1.052 r90 bottom locked
U14 "W25Q128JVSIQ" "SOIC-8 (208 mil)" 3.855,19.033 r90 top locked
U15 "LTR-303ALS" "6-Pin ChipLED" 0,0 r0 top locked
U16 "MP34DT06JTR" MP34DT06JTR 39.45,-38.95 r180 top locked
U17 "MP34DT06JTR" MP34DT06JTR -39.45,38.95 r0 top locked
U18 "BGT60TR13CE6327XUMA1" pg-vf2bga-40 -10.035,-64.961 r0 top locked
U19 "ADS1015IDGSR" VSSOP-10 38.854,-53.534 r180 bottom locked
U20 "TPS2375DR" SOIC-8 16.492,-22.585 r0 top locked
U21 "SP0504BAHTG" SOT-23-5 4.561,-13.65 r180 top locked value=30pF
U22 "TX4138" 8-SOIC-EP 9.268,-36.31 r0 top locked
U23 "W5500" "48-LQFP (7x7)_" 15.889,1.995 r90 bottom locked
U24 "MP34DT06JTR" MP34DT06JTR -39.476,-38.951 r180 top locked
U25 "MP34DT06JTR" MP34DT06JTR 39.477,38.95 r0 top locked
U26 "ENS160-BGLT" ENS160-BGLT -37.096,-57.638 r0 top locked
U27 "PCA9536D,118" SOP-8 9.63,18.783 r270 top locked
X1 "32.768kHz" SMD3215-2P 55.869,-9.51 r270 bottom locked
X2 "8MHz" SMD5032-2P 48.853,-14.209 r180 bottom locked
X3 "25MHz" Q22FA12800090 16.498,12.279 r90 bottom locked
X4 "40MHz" X322540MPB4SI_ -6.706,29.222 r0 top locked value=40MHZ
X5 "YSO690PR" YSO690PR -2.963,-65.961 r180 top locked

## Footprints (in the part's own frame and the unit in brackets; to place one, negate y for a bottom-side part, rotate by r counter-clockwise, add the part's x,y. Pads: shape width x height; smd on the part's side, far side on the other; paste and mask are expansions set on the pad)
"6-DFN (1.2x1.3)" [mm]
  rect 0.53x0.28 smd mask+0.055: 1(-0.335,0.4) 2(-0.335,0) 3(-0.335,-0.4) 4(0.335,-0.4) 5(0.335,0) 6(0.335,0.4)
  silkscreen extent -0.91,-0.64 0.69,0.64, body extent -0.65,-0.6 0.65,0.6, height 0.55
"6-Pin ChipLED" [mm] "SENSOR OPT AMBIENT 6DFN"
  rect 0.65x0.3 smd: 1(-0.9,0.65) 2(-0.9,0) 3(-0.9,-0.65) 4(0.9,-0.65) 5(0.9,0) 6(0.9,0.65)
  silkscreen extent -1.52,-1.07 1.02,1.07, body extent -1,-1 1,1, height 0.71
8-SOIC-EP [mm]
  rect 1.55x0.6 smd: 1(-2.7,1.905) 2(-2.7,0.635) 3(-2.7,-0.635) 4(-2.7,-1.905) 5(2.7,-1.905) 6(2.7,-0.635) 7(2.7,0.635) 8(2.7,1.905)
  rect 2.613x3.502 smd: 9(0,0)
  silkscreen extent -3.76,-2.49 1.99,2.49, body extent -3,-2.45 3,2.45, height 1.7
"48-LQFP (7x7)_" [mm]
  rect 1.22x0.32 smd: 1(-4.25,2.75) 2(-4.25,2.25) 3(-4.25,1.75) 4(-4.25,1.25) 5(-4.25,0.75) 6(-4.25,0.25) 7(-4.25,-0.25) 8(-4.25,-0.75) 9(-4.25,-1.25) 10(-4.25,-1.75) 11(-4.25,-2.25) 12(-4.25,-2.75) 25(4.25,-2.75) 26(4.25,-2.25) 27(4.25,-1.75) 28(4.25,-1.25) 29(4.25,-0.75) 30(4.25,-0.25) 31(4.25,0.25) 32(4.25,0.75) 33(4.25,1.25) 34(4.25,1.75) 35(4.25,2.25) 36(4.25,2.75)
  rect 0.32x1.22 smd: 13(-2.75,-4.25) 14(-2.25,-4.25) 15(-1.75,-4.25) 16(-1.25,-4.25) 17(-0.75,-4.25) 18(-0.25,-4.25) 19(0.25,-4.25) 20(0.75,-4.25) 21(1.25,-4.25) 22(1.75,-4.25) 23(2.25,-4.25) 24(2.75,-4.25) 37(2.75,4.25) 38(2.25,4.25) 39(1.75,4.25) 40(1.25,4.25) 41(0.75,4.25) 42(0.25,4.25) 43(-0.25,4.25) 44(-0.75,4.25) 45(-1.25,4.25) 46(-1.75,4.25) 47(-2.25,4.25) 48(-2.75,4.25)
  silkscreen extent -5.16,-3.58 3.66,3.58, body extent -4.51,-4.51 4.49,4.49, height 1.43
"56-QFN (7x7)" [mm]
  rect 0.65x0.22 smd: 1(-3.425,2.6) 2(-3.425,2.2) 3(-3.425,1.8) 4(-3.425,1.4) 5(-3.425,1) 6(-3.425,0.6) 7(-3.425,0.2) 8(-3.425,-0.2) 9(-3.425,-0.6) 10(-3.425,-1) 11(-3.425,-1.4) 12(-3.425,-1.8) 13(-3.425,-2.2) 14(-3.425,-2.6) 29(3.425,-2.6) 30(3.425,-2.2) 31(3.425,-1.8) 32(3.425,-1.4) 33(3.425,-1) 34(3.425,-0.6) 35(3.425,-0.2) 36(3.425,0.2) 37(3.425,0.6) 38(3.425,1) 39(3.425,1.4) 40(3.425,1.8) 41(3.425,2.2) 42(3.425,2.6)
  rect 0.22x0.65 smd: 15(-2.6,-3.425) 16(-2.2,-3.425) 17(-1.8,-3.425) 18(-1.4,-3.425) 19(-1,-3.425) 20(-0.6,-3.425) 21(-0.2,-3.425) 22(0.2,-3.425) 23(0.6,-3.425) 24(1,-3.425) 25(1.4,-3.425) 26(1.8,-3.425) 27(2.2,-3.425) 28(2.6,-3.425) 43(2.6,3.425) 44(2.2,3.425) 45(1.8,3.425) 46(1.4,3.425) 47(1,3.425) 48(0.6,3.425) 49(0.2,3.425) 50(-0.2,3.425) 51(-0.6,3.425) 52(-1,3.425) 53(-1.4,3.425) 54(-1.8,3.425) 55(-2.2,3.425) 56(-2.6,3.425)
  rect 4x4 smd: 57(0,0)
  silkscreen extent -4.04,-3.56 3.56,3.56, body extent -3.5,-3.51 3.5,3.49, height 0.92
"64-LQFP (10x10)" [mm]
  rect 1.2x0.3 smd: 1(-5.75,3.75) 2(-5.75,3.25) 3(-5.75,2.75) 4(-5.75,2.25) 5(-5.75,1.75) 6(-5.75,1.25) 7(-5.75,0.75) 8(-5.75,0.25) 9(-5.75,-0.25) 10(-5.75,-0.75) 11(-5.75,-1.25) 12(-5.75,-1.75) 13(-5.75,-2.25) 14(-5.75,-2.75) 15(-5.75,-3.25) 16(-5.75,-3.75) 33(5.75,-3.75) 34(5.75,-3.25) 35(5.75,-2.75) 36(5.75,-2.25) 37(5.75,-1.75) 38(5.75,-1.25) 39(5.75,-0.75) 40(5.75,-0.25) 41(5.75,0.25) 42(5.75,0.75) 43(5.75,1.25) 44(5.75,1.75) 45(5.75,2.25) 46(5.75,2.75) 47(5.75,3.25) 48(5.75,3.75)
  rect 0.3x1.2 smd: 17(-3.75,-5.75) 18(-3.25,-5.75) 19(-2.75,-5.75) 20(-2.25,-5.75) 21(-1.75,-5.75) 22(-1.25,-5.75) 23(-0.75,-5.75) 24(-0.25,-5.75) 25(0.25,-5.75) 26(0.75,-5.75) 27(1.25,-5.75) 28(1.75,-5.75) 29(2.25,-5.75) 30(2.75,-5.75) 31(3.25,-5.75) 32(3.75,-5.75) 49(3.75,5.75) 50(3.25,5.75) 51(2.75,5.75) 52(2.25,5.75) 53(1.75,5.75) 54(1.25,5.75) 55(0.75,5.75) 56(0.25,5.75) 57(-0.25,5.75) 58(-0.75,5.75) 59(-1.25,5.75) 60(-1.75,5.75) 61(-2.25,5.75) 62(-2.75,5.75) 63(-3.25,5.75) 64(-3.75,5.75)
  silkscreen extent -6.63,-5.36 5.28,5.36, body extent -6,-6 6,6, height 1.6
53261-0771 [mm]
  rect 0.8x1.6 smd: 1(-3.75,1.45) 2(-2.5,1.45) 3(-1.25,1.45) 4(0,1.45) 5(1.25,1.45) 6(2.5,1.45) 7(3.75,1.45)
  rect 2.1x3 smd: 8(-6.3,-1.45) 9(6.3,-1.45)
  silkscreen extent -6.88,-3.65 6.88,2.16, body extent -6.95,-3.57 6.95,1.63, height 3.6
53261-0871 [mm]
  rect 0.8x1.6 smd mask+0.076: 1(-4.375,1.45) 2(-3.125,1.45) 3(-1.875,1.45) 4(-0.625,1.45) 5(0.625,1.45) 6(1.875,1.45) 7(3.125,1.45) 8(4.375,1.45)
  rect 2.1x3 smd mask+0.076: S1(-6.925,-1.45) S2(6.925,-1.45)
  silkscreen extent -7.57,-3.55 7.57,2.44, body extent -7.55,-3.51 7.6,1.69, height 3.4
BME680 [mm]
  rect 0.6x0.6 smd: 1(1.2,1.2) 2(1.2,0.4) 3(1.2,-0.4) 4(1.2,-1.2) 5(-1.2,-1.2) 6(-1.2,-0.4) 7(-1.2,0.4) 8(-1.2,1.2)
  silkscreen extent -0.64,-1.55 1.85,1.55, body extent -1.5,-1.5 1.5,1.5, height 1
CAP-0201 [mm]
  rect 0.3x0.3 smd mask+0.055: 1(-0.3,0) 2(0.3,0)
  silkscreen extent -0.53,-0.23 0.53,0.23, body extent -0.3,-0.15 0.3,0.15, height 0.28
Cap-0402 [mil]
  rect 18x25 smd mask+2.36: 1(-18.5,0) 2(18.5,0)
  silkscreen extent -31,-16 31,16, body extent -20,-10 20,10, height 19
Cap-0603 [mil]
  rect 30x35 smd mask+2.36: 1(-30,0) 2(30,0)
  silkscreen extent -49,-21 49,21, body extent -32,-16 31,16, height 34
Cap-0805 [mil] "SMD 0805"
  rect 40x60 smd mask+2.76: 1(-40,0) 2(40,0)
  silkscreen extent -64,-34 64,34, body extent -39,-25 39,25, height 30
Cap-1206 [mil] "SMD 1206"
  rect 60x70 smd: 1(-50,0) 2(50,0)
  silkscreen extent -84,-39 84,39, body extent -63,-31 63,32, height 39
Case-A [mm]
  rect 1.42x1.13 smd: 1(-1.2,0) 2(1.2,0)
  silkscreen extent -2.72,-0.97 1.63,0.97, body extent -1.6,-0.9 1.6,0.9, height 1.8
CASE-B [mm]
  rect 1.7x3 smd paste+0: 1(-1.7,0) 2(1.7,0)
  silkscreen extent -3.35,-1.63 2.03,1.63, body extent -1.85,-1.5 1.85,1.5, height 2.16
Case-E [mm]
  rect 2.79x2.57 smd: 1(0,0) 2(6.44,0)
  silkscreen extent -1.56,-2.31 7.03,2.31, body extent -0.27,-2.21 6.92,2.21, height 2.88
CYH127-33UH [mm]
  rect 4x6 smd mask+0.055: 1(-5.25,0) 2(5.25,0)
  silkscreen extent -6.05,-6.05 6.05,6.05, body extent -6,-6 6,6, height 7.98
DFN-6-EP(2x2) [mm]
  rect 0.6x0.3 smd: 1(-0.917,0.5) 2(-0.917,0) 3(-0.917,-0.5) 4(0.918,-0.5) 5(0.918,0) 6(0.918,0.5)
  rect 0.56x1.37 smd: 7(0,0)
  silkscreen extent -1.5,-1 1,1, body extent -1.01,-1 1.01,1, height 0.76
EFM-620 [mm]
  round 2.5 hole 1.25: 1(-9,0) 2(9,0)
  silkscreen extent -20,-20 20,20, body extent -20,-20 20,20, height 20
ENS160-BGLT [mm]
  rect 0.85x0.85 smd paste+0 mask+0.055: 1(-1.05,1.05) 2(-1.05,0) 3(-1.05,-1.05) 4(0,-1.05) 5(1.05,-1.05) 6(1.05,0) 7(1.05,1.05) 8(0,1.05) 9(0,0)
  silkscreen extent -1.85,-1.57 1.57,1.57, body extent -1.5,-1.5 1.5,1.5, height 0.9
ESOP-8 [mm]
  rect 1.2x0.6 smd: 1(-2.909,1.905) 2(-2.909,0.635) 3(-2.909,-0.635) 4(-2.909,-1.905) 5(2.909,-1.905) 6(2.909,-0.635) 7(2.909,0.635) 8(2.909,1.905)
  rect 2.4x3.3 smd: 9(0,0)
  silkscreen extent -3.88,-2.51 1.85,2.51, body extent -3,-2.45 3,2.45, height 1.75
"ESP Patch Antenna" [mm]
  rect 0.5x0.5 smd: ANT#(2.616,0.254) GND(0.305,0.254)
  Top Layer region: 14,0.243 14.5,0.243 14.5,5.058 14,5.058
  Top Layer region: 11.797,5.41 11.797,4.91 14.497,4.91 14.497,5.41
  Top Layer region: 12.3,5.055 11.8,5.055 11.8,2.21 12.3,2.21
  Top Layer region: 11.963,2.21 11.963,2.71 9.652,2.71 9.652,2.21
  Top Layer region: 9.3,2.21 9.8,2.21 9.8,5.029 9.3,5.029
  Top Layer region: 7,5.41 7,4.91 9.8,4.91 9.8,5.41
  Top Layer region: 7.5,5.029 7,5.029 7,2.21 7.5,2.21
  Top Layer region: 7.137,2.21 7.137,2.71 4.877,2.71 4.877,2.21
  Top Layer region: 4.5,2.21 5,2.21 5,5.029 4.5,5.029
  Top Layer region: 2.3,0 2.93,0 2.93,5.029 2.3,5.029
  Top Layer region: 4.997,4.91 4.997,5.41 -0.003,5.41 -0.003,4.91
  Top Layer region: 0,0 0.63,0 0.63,4.928 0,4.928
Fuse-0805 [mm]
  rect 1x1.7 smd: 1(-1.1,0) 2(1.1,0)
  silkscreen extent -0.41,-0.81 0.41,0.81, body extent -1.1,-0.75 1.1,0.75, height 1.24
HDR1X3_ [mm] "Connector; Header; 3 Position"
  rect 1.8x1.8 hole 1.02: 1(0,0)
  round 1.8 hole 1.02: 2(2.54,0) 3(5.08,0)
  silkscreen extent -1.27,-1.27 6.35,1.27, body extent -1.27,-1.24 6.35,1.25, height 8.54
"HDR1X4 Female" [mm]
  rect 1.6x1.6 hole 0.95: 1(-3.81,0)
  round 1.6 hole 0.95: 2(-1.27,0) 3(1.27,0) 4(3.81,0)
  silkscreen extent -5.49,-1.27 5.36,1.27, body extent -5.38,-1.3 5.28,1.24, height 8.5
HR915302AE [mm]
  round 1.6 hole 0.92: 1(5.075,7.395) 2(4.06,9.935) 3(3.045,7.395) 4(2.03,9.935) 5(1.015,7.395) 6(0,9.935) 7(-1.015,7.395) 8(-2.03,9.935) 9(-3.045,7.395) 10(-4.06,9.935) 11(-5.075,7.395) 12(7.105,7.395) 13(6.09,9.935) 14(-6.09,9.935) 15(-7.105,7.395)
  rect 2x4.4 hole 0.52 square: SH1(-9.8,-3.135) SH2(9.8,-3.135)
  rect 0.6x2.6 smd: SH3(8.8,-9.935) SH4(-8.8,-9.935)
  silkscreen extent -9.19,-8.31 9.19,11.28, body extent -10.3,-12.74 10.3,11.26, height 8.45
IND-0201 [mm]
  rect 0.25x0.3 smd mask+0.055: 1(-0.275,0) 2(0.275,0)
  silkscreen extent -0.48,-0.23 0.48,0.23, body extent -0.3,-0.15 0.3,0.15, height 0.15
IND-0402 [mm]
  rect 0.4x0.6 smd: 1(-0.35,0) 2(0.35,0)
  silkscreen extent -0.71,-0.46 0.71,0.46, body extent -0.5,-0.25 0.5,0.25, height 0.25
"IND-0603 (1608 Metric)" [mm] "0.063\" L x 0.032\" W (1.60mm x 0.80mm)"
  rect 0.6x0.8 smd: 1(-0.7,0) 2(0.7,0)
  silkscreen extent -0.2,-0.46 0.23,0.46, body extent -0.8,-0.4 0.8,0.4, height 0.78
Ind-0805 [mm] "Inductor 0805"
  rect 1.2x1.32 smd: 1(-1,0) 2(1,0)
  silkscreen extent -0.25,-0.69 0.25,0.69, body extent -1,-0.62 1,0.63, height 0.47
"IND-1008 (2520 Metric)" [mm]
  rect 0.65x2.2 smd: 1(-0.95,0) 2(0.95,0)
  silkscreen extent -0.41,-1.04 0.41,1.04, body extent -1.25,-1 1.25,1, height 1.2
K5-1678DA-01 [mm]
  round 1.8 hole 1.1: 1(-1.8,2.25) 2(1.8,-2.25)
  round 0 hole 1.72 unplated: MH(0,0)
  silkscreen extent -3.05,-2 3,2.62, body extent -2.98,-2.28 3.02,2.32, height 8.7
LED-0402 [mm]
  rect 0.62x0.72 smd: 1(-0.475,0) 2(0.475,0)
  silkscreen extent -0.89,-0.51 1.55,0.51, body extent -0.5,-0.25 0.51,0.25, height 0.45
LED-0603 [mm]
  rect 0.5x1 smd: 1(-0.75,0) 2(0.75,0)
  silkscreen extent -1.12,-0.66 1.75,0.66, body extent -0.82,-0.37 0.82,0.36, height 0.68
"MF52B 103F3950-100" [mm]
  round 0.8 hole 0.4: 1(-0.216,0) 2(1,0)
MICS-6814 [mm]
  rect 1.45x0.55 smd: A(0,0) B(0,-1.27) C(0,-2.54) F(4.4,-2.54) G(4.4,-1.27) H(4.4,0)
  rect 0.55x1.45 smd: D(0.93,-4.47) E(3.47,-4.47) J(3.47,1.93) K(0.93,1.93)
  silkscreen extent -1.09,-4.84 4.78,2.3, body extent -0.3,-4.77 4.7,2.23, height 1.92
MK-11C04-G013 [mm]
  rect 0.6x0.83 smd: 1(-1,0.678) 2(1,0.678) C(0,0.678)
  rect 0.92x0.72 smd: 4(3,-0.677) 5(-3,-0.677)
  round 0 hole 0.81 unplated: MH(-1.5,-0.602) MH(1.5,-0.602)
  silkscreen extent -2.79,-1.94 2.79,0.85, body extent -3.25,-3.06 3.25,0.64, height 0.7
MP34DT06JTR [mm]
  rect 0.4x0.95 smd: 1(0.425,-0.675) 2(0.425,0.675) 3(-0.425,0.675) 4(-0.425,-0.675)
  rect 0.35x2.3 smd: 5(-1.225,0) 5(1.225,0)
  rect 1.3x0.35 smd: 5(0,1.725) 5(0,-1.725)
  silkscreen extent -1.55,-2.05 1.74,2.05, body extent -1.5,-2 1.5,2, height 1.1
pg-vf2bga-40 [mm]
  round 0.285 smd: A1(-2.75,-2) A2(-2.75,-1.5) A3(-2.75,-1) A4(-2.75,-0.5) A5(-2.75,0) A6(-2.75,0.5) A7(-2.75,1) A8(-2.75,1.5) A9(-2.75,2) B1(-2.25,-2) B3(-2.25,-1) B4(-2.25,-0.5) B8(-2.25,1.5) B9(-2.25,2) C1(-1.75,-2) C9(-1.75,2) D1(-1.25,-2) D9(-1.25,2) E1(-0.75,-2) E9(-0.75,2) F1(-0.25,-2) F9(-0.25,2) G1(0.25,-2) G9(0.25,2) H1(0.75,-2) H9(0.75,2) J1(1.25,-2) J9(1.25,2) K1(1.75,-2) K9(1.75,2) L1(2.25,-2) L9(2.25,2) M1(2.75,-2) M2(2.75,-1.5) M3(2.75,-1) M4(2.75,-0.5) M5(2.75,0) M6(2.75,0.5) M7(2.75,1) M9(2.75,2)
  silkscreen extent -3.45,-2.39 3.15,2.72, body extent -3.4,-2.32 3.1,2.68, height 0.9
"Pogo 4 Pin" [mm]
  round 1.6 smd: 1(-3.75,0) 2(-1.25,0) 3(1.25,0) 4(3.75,0)
  silkscreen extent -5.11,-1.09 4.83,1.09
"POGO 6 Pin" [mm]
  round 1.6 smd: 1(-5,0) 2(-2.5,0) 3(0,0) 4(2.5,0) 5(5,0) 6(7.5,0)
  silkscreen extent -6.36,-1.09 8.66,1.09
Q22FA12800090 [mm]
  rect 0.95x0.85 smd: 1(0,-1.15) 2(1.45,-1.15) 3(1.45,0) 4(0,0)
  silkscreen extent -0.7,-1.41 0.78,0.29, body extent -0.3,-1.36 1.7,0.24, height 0.65
Res-0402 [mil]
  rect 18x25 smd mask+2.17: 1(-18.5,0) 2(18.5,0)
  silkscreen extent -32,-17 32,16, body extent -23,-11 23,11, height 16
Res-0603 [mil]
  rect 30x35 smd: 1(-30,0) 2(30,0)
  silkscreen extent -48,-21 48,21, body extent -31,-17 31,17, height 18
RES-0805 [mil] "SMD 0805"
  rect 40x50 smd: 1(-40,0) 2(40,0)
  silkscreen extent -64,-29 64,29, body extent -39,-25 39,24, height 24
SK6812-EC20 [mm]
  rect 0.8x0.7 smd: 1(0.65,-0.6) 2(0.65,0.6) 3(-0.65,0.6) 4(-0.65,-0.6)
  silkscreen extent -1,-1 1.35,1, body extent -1,-1 1,1, height 0.65
SMA [mm]
  rect 2.5x1.7 smd: 1(-2,0) 2(2,0)
  silkscreen extent -4.44,-1.42 2.06,1.42, body extent -2.6,-1.3 2.6,1.3, height 2.4
SMB_ [mm]
  rect 2.8x2.4 smd: 1(-2.3,0) 2(2.3,0)
  silkscreen extent -2.21,-1.9 4.83,1.91, body extent -2.7,-1.8 2.7,1.8, height 2.3
SMD3215-2P [mm]
  rect 1x1.8 smd: 1(-1.25,0) 2(1.25,0)
  silkscreen extent -0.56,-0.81 0.56,0.81, body extent -1.6,-0.75 1.6,0.75, height 0.8
SMD5032-2P [mm]
  rect 1.7x2.4 smd: 1(-1.85,0) 2(1.85,0)
  silkscreen extent -2.51,-1.65 2.51,1.65, body extent -2.5,-1.6 2.5,1.6, height 1.3
SMRH74-220MT [mm]
  rect 2x2.5 smd: 1(-3.2,0) 2(3.2,0)
  silkscreen extent -3.75,-3.75 3.75,3.75, body extent -3.74,-3.76 3.76,3.74, height 4.52
SOD-123FL [mm]
  rect 1.34x1.8 smd: 1(-1.43,0) 2(1.43,0)
  silkscreen extent -3.25,-1.17 2.26,1.17, body extent -1.8,-0.82 1.8,0.82, height 0.95
SOIC-8 [mm]
  rect 1.55x0.6 smd: 1(-2.7,1.905) 2(-2.7,0.635) 3(-2.7,-0.635) 4(-2.7,-1.905) 5(2.7,-1.905) 6(2.7,-0.635) 7(2.7,0.635) 8(2.7,1.905)
  silkscreen extent -3.76,-2.49 1.99,2.49, body extent -3,-2.45 3,2.45, height 1.7
"SOIC-8 (208 mil)" [mm]
  rect 1.61x0.58 smd: 1(-3.605,1.905) 2(-3.605,0.635) 3(-3.605,-0.635) 4(-3.605,-1.905) 5(3.605,-1.905) 6(3.605,-0.635) 7(3.605,0.635) 8(3.605,1.905)
  silkscreen extent -4.7,-2.69 2.69,2.69, body extent -3.95,-2.64 3.95,2.64, height 2.16
"Solder Bridge" [mil] "Solder Bridge ON"
  rect 30x35 smd: 1(-30,0) 2(30,0)
  silkscreen extent -50,-22 50,22
"Solder Bridge 0402" [mil]
  rect 18x25 smd mask+2.17: 1(-18.5,0) 2(18.5,0)
  silkscreen extent -32,-17 32,16
SOP-8 [mm]
  rect 1.3x0.7 smd: 1(-2.75,1.905) 2(-2.75,0.635) 3(-2.75,-0.635) 4(-2.75,-1.905) 5(2.75,-1.905) 6(2.75,-0.635) 7(2.75,0.635) 8(2.75,1.905)
  silkscreen extent -3.69,-2.57 2.03,2.57, body extent -3.1,-2.5 3.1,2.5, height 1.76
Sot-23 [mm] "TRANS NPN 40V 0.6A SOT23"
  rect 0.82x0.92 smd: 1(-0.95,-1) 2(0.95,-1) 3(0,1)
  silkscreen extent -1.68,-1.3 1.55,0.81, body extent -1.5,-1.25 1.5,1.25, height 1.05
SOT-23 [mm] "TRANS NPN 40V 0.6A SOT23"
  rect 0.82x0.92 smd: 1(-0.95,-1) 2(0.95,-1) 3(0,1)
  silkscreen extent -1.68,-1.3 1.55,0.81, body extent -1.5,-1.25 1.5,1.25, height 1.05
SOT-23-5 [mm]
  rect 1.1x0.6 smd: 1(-1.3,0.95) 2(-1.3,0) 3(-1.3,-0.95) 4(1.3,-0.95) 5(1.3,0.95)
  silkscreen extent -2.13,-1.5 0.88,1.5, body extent -1.4,-1.45 1.4,1.45, height 1.45
SOT-23-6 [mm]
  rect 1.22x0.62 smd: 1(-1.31,0.95) 2(-1.31,0) 3(-1.31,-0.95) 4(1.31,-0.95) 5(1.31,0) 6(1.31,0.95)
  silkscreen extent -2.18,-1.52 0.86,1.52, body extent -1.5,-1.5 1.5,1.5, height 1.47
SOT-25-5 [mm]
  rect 1x0.7 smd: 1(-1.2,0.95) 2(-1.2,0) 3(-1.2,-0.95) 4(1.2,-0.95) 5(1.2,0.95)
  silkscreen extent -1.98,-1.55 0.76,1.55, body extent -1.19,-1.5 1.21,1.5, height 1.1
SOT-89-3 [mm]
  rect 0.58x1.73 smd: 1(-1.5,-1.132) 2(0,-1.132) 3(1.5,-1.132)
  rect 1.933x3.03 smd: 2(0,1.132)
  silkscreen extent -2.31,-1.27 2.31,1.73, body extent -2.25,-1.84 2.25,2.41, height 1.54
SOT-143-4_ [mm]
  rect 1.4x1.1 smd: 1(0,0)
  rect 1.4x0.8 smd: 2(0,-1.7) 3(2.2,-1.7) 4(2.2,0.2)
  silkscreen extent -0.99,-2.27 1.76,0.77, body extent -0.08,-2.21 2.29,0.71, height 1.22
SOT-583 [mm]
  rect 0.67x0.3 smd: 1(-0.74,0.75) 2(-0.74,0.25) 3(-0.74,-0.25) 4(-0.74,-0.75) 5(0.74,-0.75) 6(0.74,-0.25) 7(0.74,0.25) 8(0.74,0.75)
  silkscreen extent -1.35,-1.07 0.56,1.07, body extent -0.8,-1.05 0.8,1.05, height 0.6
SOT-723 [mm]
  rect 0.5x0.45 smd: 1(-0.4,-0.575) 2(0.4,-0.575) 3(0,0.575)
  silkscreen extent -0.94,-0.66 0.64,0.64, body extent -0.6,-0.6 0.6,0.6, height 0.5
SOT_323 [mm]
  rect 0.5x0.8 smd: 1(-0.65,-1.1) 2(0.65,-1.1) 3(0,1.1)
  silkscreen extent -1.19,-1.19 1.04,0.64, body extent -1.05,-1.15 1.05,1.15, height 1
TB8S [mm]
  rect 1.8x1 smd paste+0 mask+0.051: 1(2.85,-2) 2(-2.85,2) 3(2.85,2) 4(-2.85,-2)
  silkscreen extent -1.65,-2.54 1.65,2.54
Test-point [mil]
  oct 60x60 smd: 1(0,0)
  silkscreen extent -37,-37 37,37
TP12422673 [mm]
  rect 0.9x1.8 smd: 1(-2.45,-1.2) 2(2.45,-1.2) MP(-3.65,1.2) MP(3.65,1.2)
  round 0 hole 1.1 unplated: MH(-1,-0.7) MH(1,-0.7)
  silkscreen extent -3.43,-1.73 3.53,2.26, body extent -3.98,-1.68 3.98,5.74, height 3.52
TS-1185EC-C-D-B_ [mm]
  rect 1.25x0.9 smd: 1(-1.925,0.75) 1(1.925,0.75) 2(-1.925,-0.75) 2(1.925,-0.75)
  silkscreen extent -2.84,-1.52 1.78,1.52, body extent -2.33,-1.5 2.32,1.5, height 2
TSSOP-20 [mm]
  rect 1.26x0.36 smd: 1(-2.9,2.925) 2(-2.9,2.275) 3(-2.9,1.625) 4(-2.9,0.975) 5(-2.9,0.325) 6(-2.9,-0.325) 7(-2.9,-0.975) 8(-2.9,-1.625) 9(-2.9,-2.275) 10(-2.9,-2.925) 11(2.9,-2.925) 12(2.9,-2.275) 13(2.9,-1.625) 14(2.9,-0.975) 15(2.9,-0.325) 16(2.9,0.325) 17(2.9,0.975) 18(2.9,1.625) 19(2.9,2.275) 20(2.9,2.925)
  silkscreen extent -3.82,-3.35 1.93,3.35, body extent -3.3,-3.3 3.3,3.3, height 1.09
TYPE-C-31-M-12_ [mm]
  rect 0.6x1.2 smd: A1/B12(0,0) A4/B9(0.8,0) B1/A12(6.4,0) B4/A9(5.6,0)
  rect 0.3x1.2 smd: A5(1.95,0) A6(2.95,0) A7(3.45,0) A8(4.45,0) B5(4.95,0) B6(3.95,0) B7(2.45,0) B8(1.45,0)
  round 0 hole 0.62 unplated: MH(0.31,-1.07) MH(6.09,-1.07)
  oval 0.9x2 hole 0.6 slot 1.7 at 90 deg: S1(7.525,-0.57) S4(-1.125,-0.57)
  oval 0.9x1.7 hole 0.6 slot 1.4 at 90 deg: S2(7.525,-4.75) S3(-1.125,-4.75)
  silkscreen extent -1.3,-5.94 7.7,-1.93, body extent -1.27,-7.32 7.67,0.58, height 3.31
VKMD1451K101MV [mm]
  rect 4.3x1.26 smd paste+0 mask+0.051: 1(0,0) 2(7.193,0)
  silkscreen extent -1.43,-4.23 7.8,4.23, body extent -1.35,-4.15 8.55,4.15, height 10.25
VMMC0571J150MV [mm]
  rect 3.3x1 smd: 1(-2.2,0) 2(2.2,0)
  silkscreen extent -3.86,-3.35 3.33,3.35, body extent -3.5,-3.3 3.5,3.3, height 5.7
"Voltlink Target" [mm]
  rect 0.5x1.6 smd: 1(-2.5,-1.262) 2(-1.5,-1.263) 3(-0.5,-1.263) 4(0.5,-1.262) 5(1.5,-1.263) 6(2.5,-1.262)
  rect 1.2x1.8 smd: MP1(-3.8,1.263) MP2(3.8,1.262)
  silkscreen extent -4.06,-1.68 4.06,2.17, body extent -4,-1.49 4,2.11, height 4.25
VSSOP-10 [mm]
  rect 1.45x0.3 smd: 1(-2.2,1) 2(-2.2,0.5) 3(-2.2,0) 4(-2.2,-0.5) 5(-2.2,-1) 6(2.2,-1) 7(2.2,-0.5) 8(2.2,0) 9(2.2,0.5) 10(2.2,1)
  silkscreen extent -3.17,-1.55 1.52,1.55, body extent -2.56,-1.5 2.51,1.5, height 1.09
WAFER-PH2.0-2PWB [mm]
  rect 1x3.5 smd: 1(-1,2.85) 2(1,2.85)
  rect 1.5x3.5 smd: MP1(-3.35,-2.85) MP2(3.35,-2.85)
  silkscreen extent -4.09,-4.85 4.04,3.56, body extent -4.03,-4.8 3.97,3.7, height 5.59
X322540MPB4SI_ [mm]
  rect 1.4x1.2 smd: 1(-1.1,-0.85) 2(1.1,-0.85) 3(1.1,0.85) 4(-1.1,0.85)
  silkscreen extent -2.13,-1.3 1.65,1.3, body extent -1.6,-1.25 1.6,1.25, height 0.8
YC164-FR-0710KL [mm]
  rect 0.9x0.65 smd: 1(0,0) 4(0,-2.48) 5(1.77,-2.48) 8(1.77,0)
  rect 0.9x0.53 smd: 2(0,-0.84) 3(0,-1.64) 6(1.77,-1.64) 7(1.77,-0.84)
  silkscreen extent -0.79,-2.96 1.77,0.48, body extent 0.08,-2.84 1.69,0.36, height 0.7
YSO690PR [mm]
  rect 0.775x0.675 smd: 1(-0.637,-0.487) 2(0.637,-0.487) 3(0.637,0.487) 4(-0.637,0.487)
  silkscreen extent -1.37,-0.84 0.08,0.84, body extent -1,-0.8 1,0.8, height 0.47

## Part data
Ant1: "ESP32 MIFA PCB ANTENNA", Item Type=Antenna, Manufacturer Part Number="ESP Patch Anttena"
BR1 BR2: "30A 950mV@1A 1A 800V TBS Bridge Rectifiers ROHS", LCSC Part Number=C65030, Manufacturer=MDD, Package=TBS, ComponentLink1Description=LCSC, ComponentLink1URL=https://www.lcsc.com/product-detail/Bridge-Rectifiers_MDD-Microdiode-Electronics-TB8S_C65030.html, Item Type="Bridge Rectifier", Manufacturer Part Number=TB8S
C1 C4 C6 C10 C14 C18 C20 C25 C26 C30 C31 C36: library part CC0402MRX5R6BB106, "CAP CER 10UF 10V X5R 0402", Case Code (Imperial)=0402, Case Code (Metric)=1005, LCSC Part Number=C962143, Manufacturer=Yageo, Max Operating Temperature=85°C, Min Operating Temperature=-55°C, Supplier Part Number 1=6097631, Tolerance=20%, Voltage Rating=10V, Capacitance=10uF, Case/Package=0402, Category="Ceramic Capacitors", ComponentLink1Description=http://www.yageo.com/documents/recent/UPY-GPHC_X5R_4V-to-50V_25.pdf?src-supplier=Digi-Key, ComponentLink1URL=http://www.yageo.com/documents/recent/UPY-GPHC_X5R_4V-to-50V_25.pdf?src-supplier=Digi-Key, Item Type=Capacitor, Manufacturer Part Number=CC0402MRX5R6BB106, Mount="Surface Mount", Packaging="Tape and Reel", Pricing 1="10000=0.02650, 20000=0.02590, 30000=0.02550, 40000=0.02530, 50000=0.02450 (USD)", RoHS=Yes, RoHS Compliant=Yes, Stock 1=80000, Supplier 1="Future Electronics"
C2: library part CC1206KKX7RCBB472, "CAP CER 4700PF 1KV X7R 1206", Case Code (Imperial)=1206, Case Code (Metric)=3216, Dielectric=X7R, Dielectric Material=Ceramic, LCSC Part Number=C107198, Manufacturer=Yageo, Max Operating Temperature=125°C, Min Operating Temperature=-55°C, Supplier Part Number 1=7130131, Tolerance=10%, Voltage Rating=1kV, Capacitance=4.7nF, Case/Package=1206, Category="Ceramic Capacitors", ComponentLink1Description=https://datasheet.ciiva.com/13208/upy-gp-np0-16v-to-50v-8-13208693.pdf?src-supplier=Mouser, ComponentLink1URL=https://datasheet.ciiva.com/13208/upy-gp-np0-16v-to-50v-8-13208693.pdf?src-supplier=Mouser, ComponentLink2Description=https://datasheet.ciiva.com/11466/hv-11466701.pdf?src-supplier=Avnet, ComponentLink2URL=https://datasheet.ciiva.com/11466/hv-11466701.pdf?src-supplier=Avnet, Depth=1.6mm, Item Type=Capacitor, Lead Free="Lead Free", Length=3.2mm, Manufacturer Part Number=CC1206KKX7RCBB472, Mount="Surface Mount", Number of Pins=2, Packaging="Tape and Reel", Pricing 1="3000=0.02860, 9000=0.02750, 15000=0.02700, 45000=0.02600, 75000=0.02510 (USD)", Radiation Hardening=No, Resistor Type=Ceramic, RoHS=Yes, RoHS Compliant=Yes, Series=CC, Stock 1=180000, Supplier 1="Future Electronics", Termination=SMD/SMT, Thickness=0.057inch, Voltage Rating (DC)=1kV, Weight=0.000571oz, Width=0.063inch
C3 C5 C7 C8 C9 C11 C12 C13 C15 C16 C17 C24 C28 C29 C33 C34 C35 C37 C42 C45 C47 C48 C49 C50 C51 C56 C59 C60 C61 C73 C77 C79 C81 C82 C83 C86 C92 C93 C98 C116 C117 C120: library part C1005X5R1H104K050BB, "CAP CER 0.1UF 50V X5R 0402", Capacitance=100nF, Case Code (Imperial)=0402, Case Code (Metric)=1005, Dielectric=X5R, Dielectric Material=Ceramic, LCSC Part Number=C2181865, Manufacturer=TDK, Max Operating Temperature=85°C, Min Operating Temperature=-55°C, Package Quantity=1, Supplier Part Number 1=445-5942-1-ND, Tolerance=10%, Voltage=50V, Case/Package=0402, ComponentLink1Description=https://product.tdk.com/info/en/catalog/spec/mlccspec_commercial_general_midvoltage_en.pdf?src-supplier=Digi-Key, ComponentLink1URL=https://product.tdk.com/info/en/catalog/spec/mlccspec_commercial_general_midvoltage_en.pdf?src-supplier=Digi-Key, ComponentLink2Description=http://www.tdk.co.jp/tefe02/e413_c.pdf?src-supplier=Future+Electronics, ComponentLink2URL=http://www.tdk.co.jp/tefe02/e413_c.pdf?src-supplier=Future+Electronics, ComponentLink3Description=https://www.verical.com/server-webapp/html/getDatasheet?partID=743571&src-supplier=Verical, ComponentLink3URL=https://www.verical.com/server-webapp/html/getDatasheet?partID=743571&src-supplier=Verical, ComponentLink4Description=http://www.tdk.co.jp/tefe02/e412_c.pdf?src-supplier=Avnet+Europe, ComponentLink4URL=http://www.tdk.co.jp/tefe02/e412_c.pdf?src-supplier=Avnet+Europe, Construction=Flat, Depth=0.5mm, Height=0.5mm, Lead Free="Lead Free", Length=1mm, Manufacturer Part Number=C1005X5R1H104K050BB, Mount="Surface Mount", Packaging="Tape and Reel", Pricing 1="1=0.12, 10=0.09, 50=0.049, 100=0.04, 500=0.02858, 1000=0.02245, 2500=0.02041, 5000=0.01878 (USD)", Radiation Hardening=No, REACH SVHC="No SVHC", Resistor Type=Ceramic, RoHS Compliant=Yes, Series=C, Stock 1=1455182, Supplier 1=Digi-Key, Termination=SMD/SMT, Thickness=0.022inch, Voltage Rating=50V, Voltage Rating (DC)=50V, Weight=2.3E-05oz, Width=0.02inch